# Altium PCB HFPB_01-PCB.PcbDoc (part 1 of 5)
Units mm, origin at the board's own origin, x right, y up, seen from the top; angles counter-clockwise.
Board outline 125 x 200 mm, 8 copper layers (Top Layer, Signal Layer 1, Signal Layer 2, Signal Layer 3, Signal Layer 4, Signal Layer 5, Signal Layer 6, Bottom Layer), stack 1.53 mm thick; 382 components, 179 nets, 1080 pads, 272 vias.
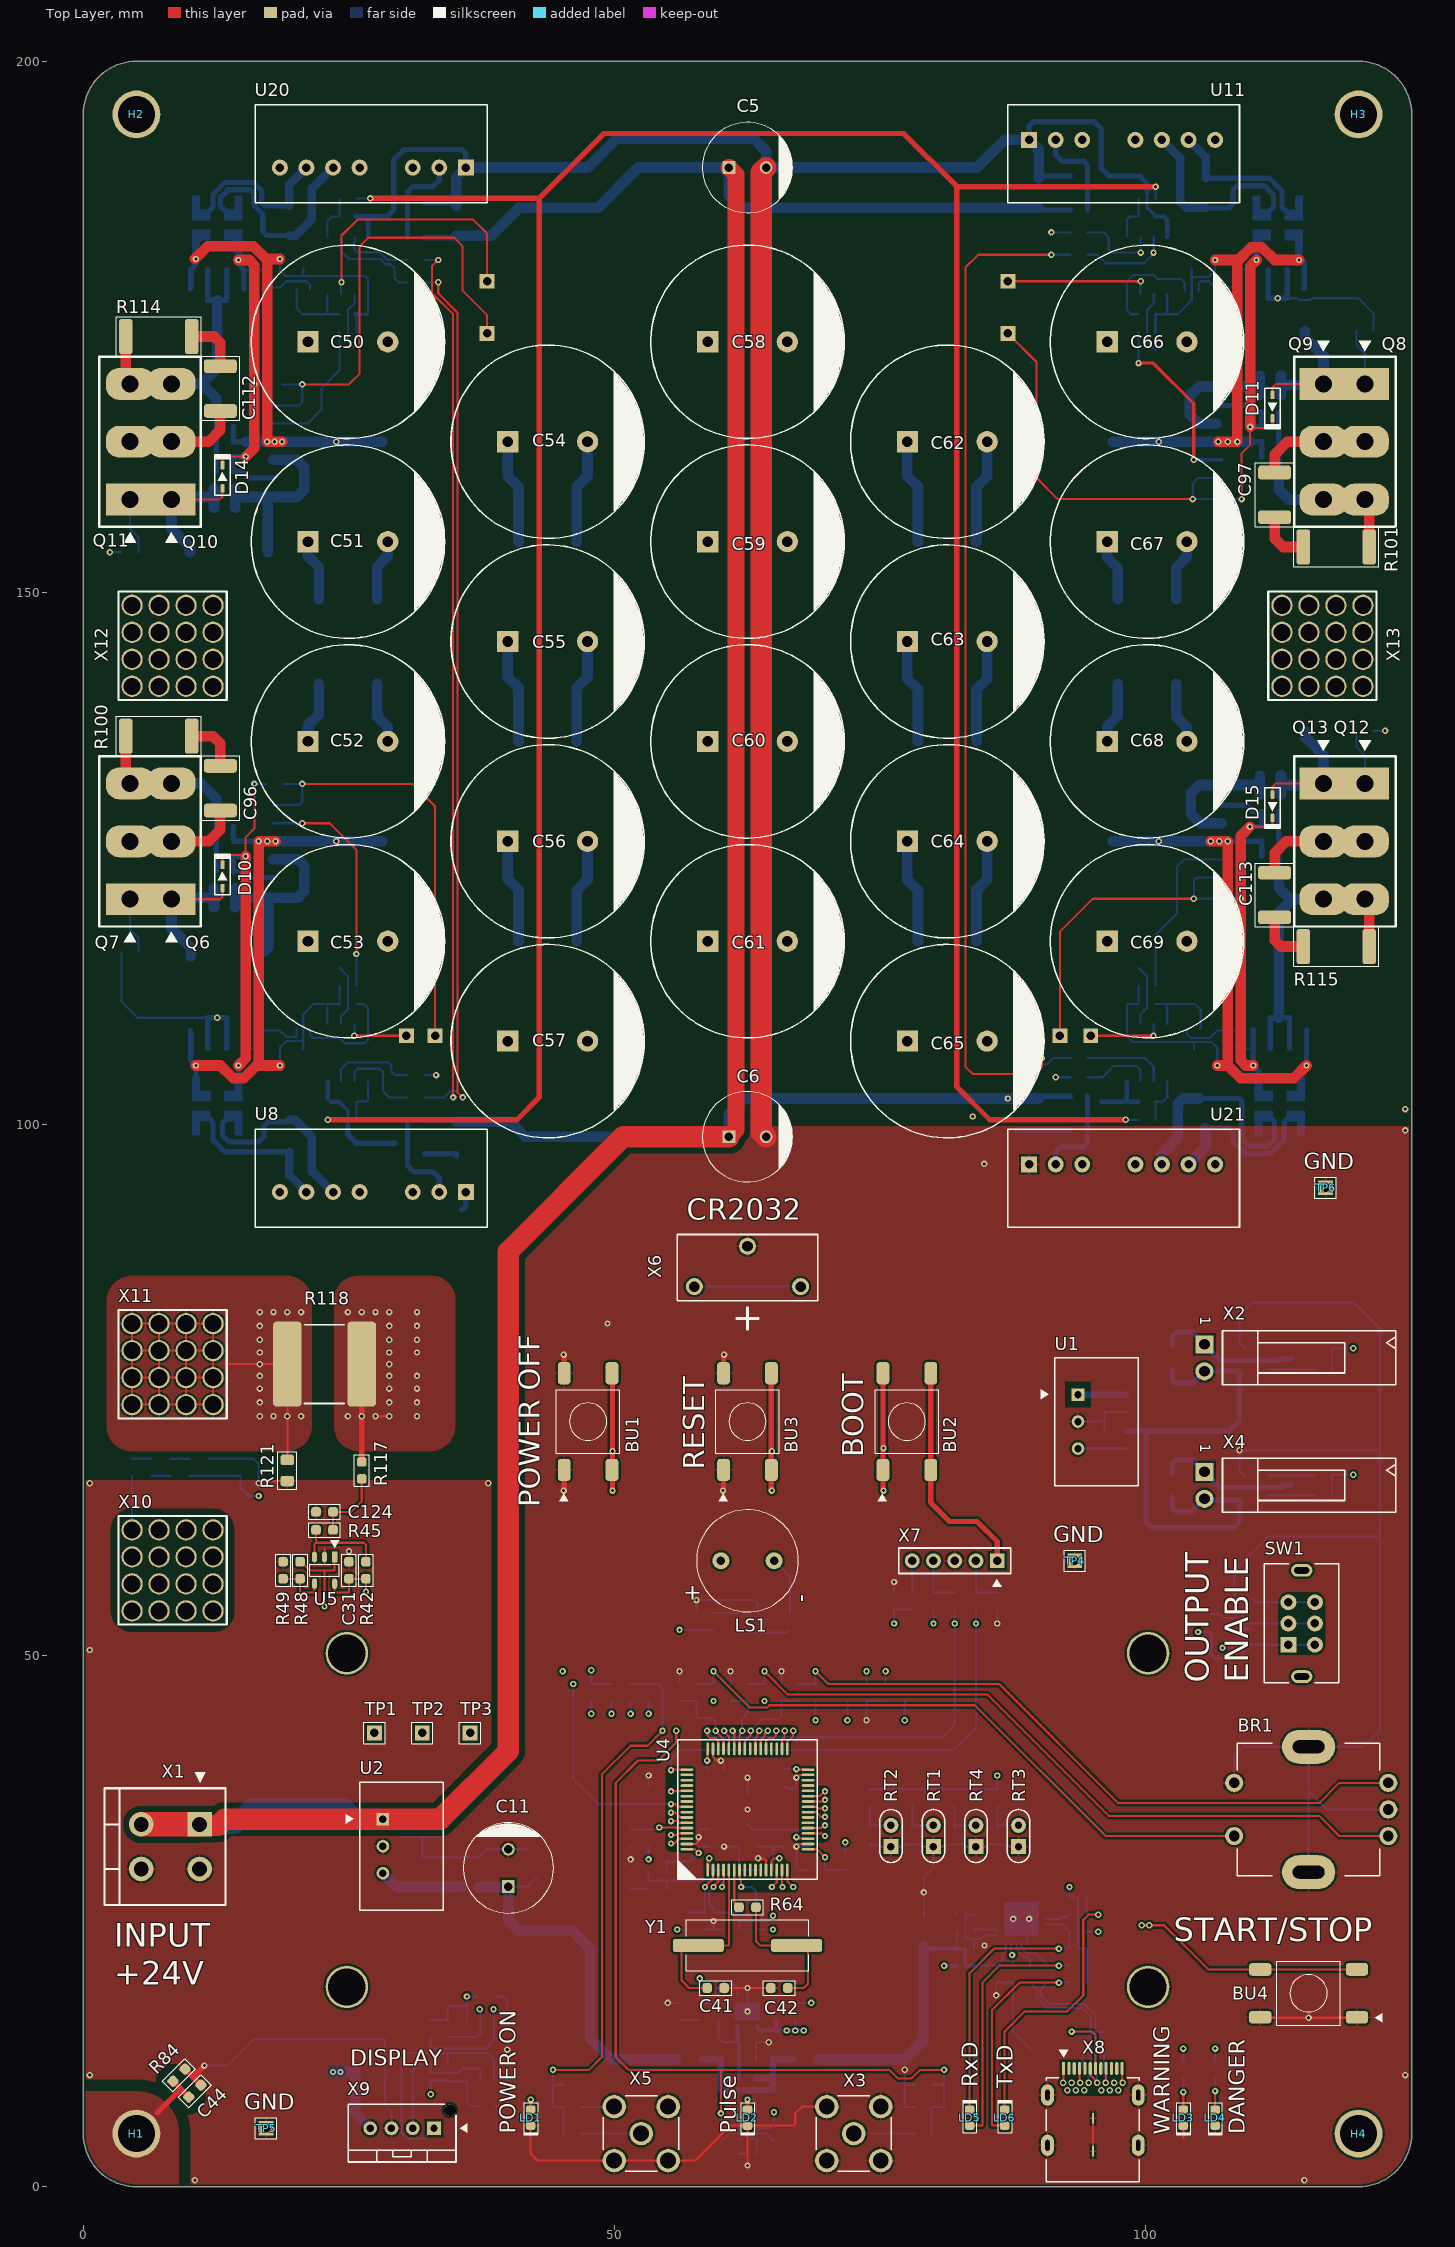
[diagram p0: Top Layer view]
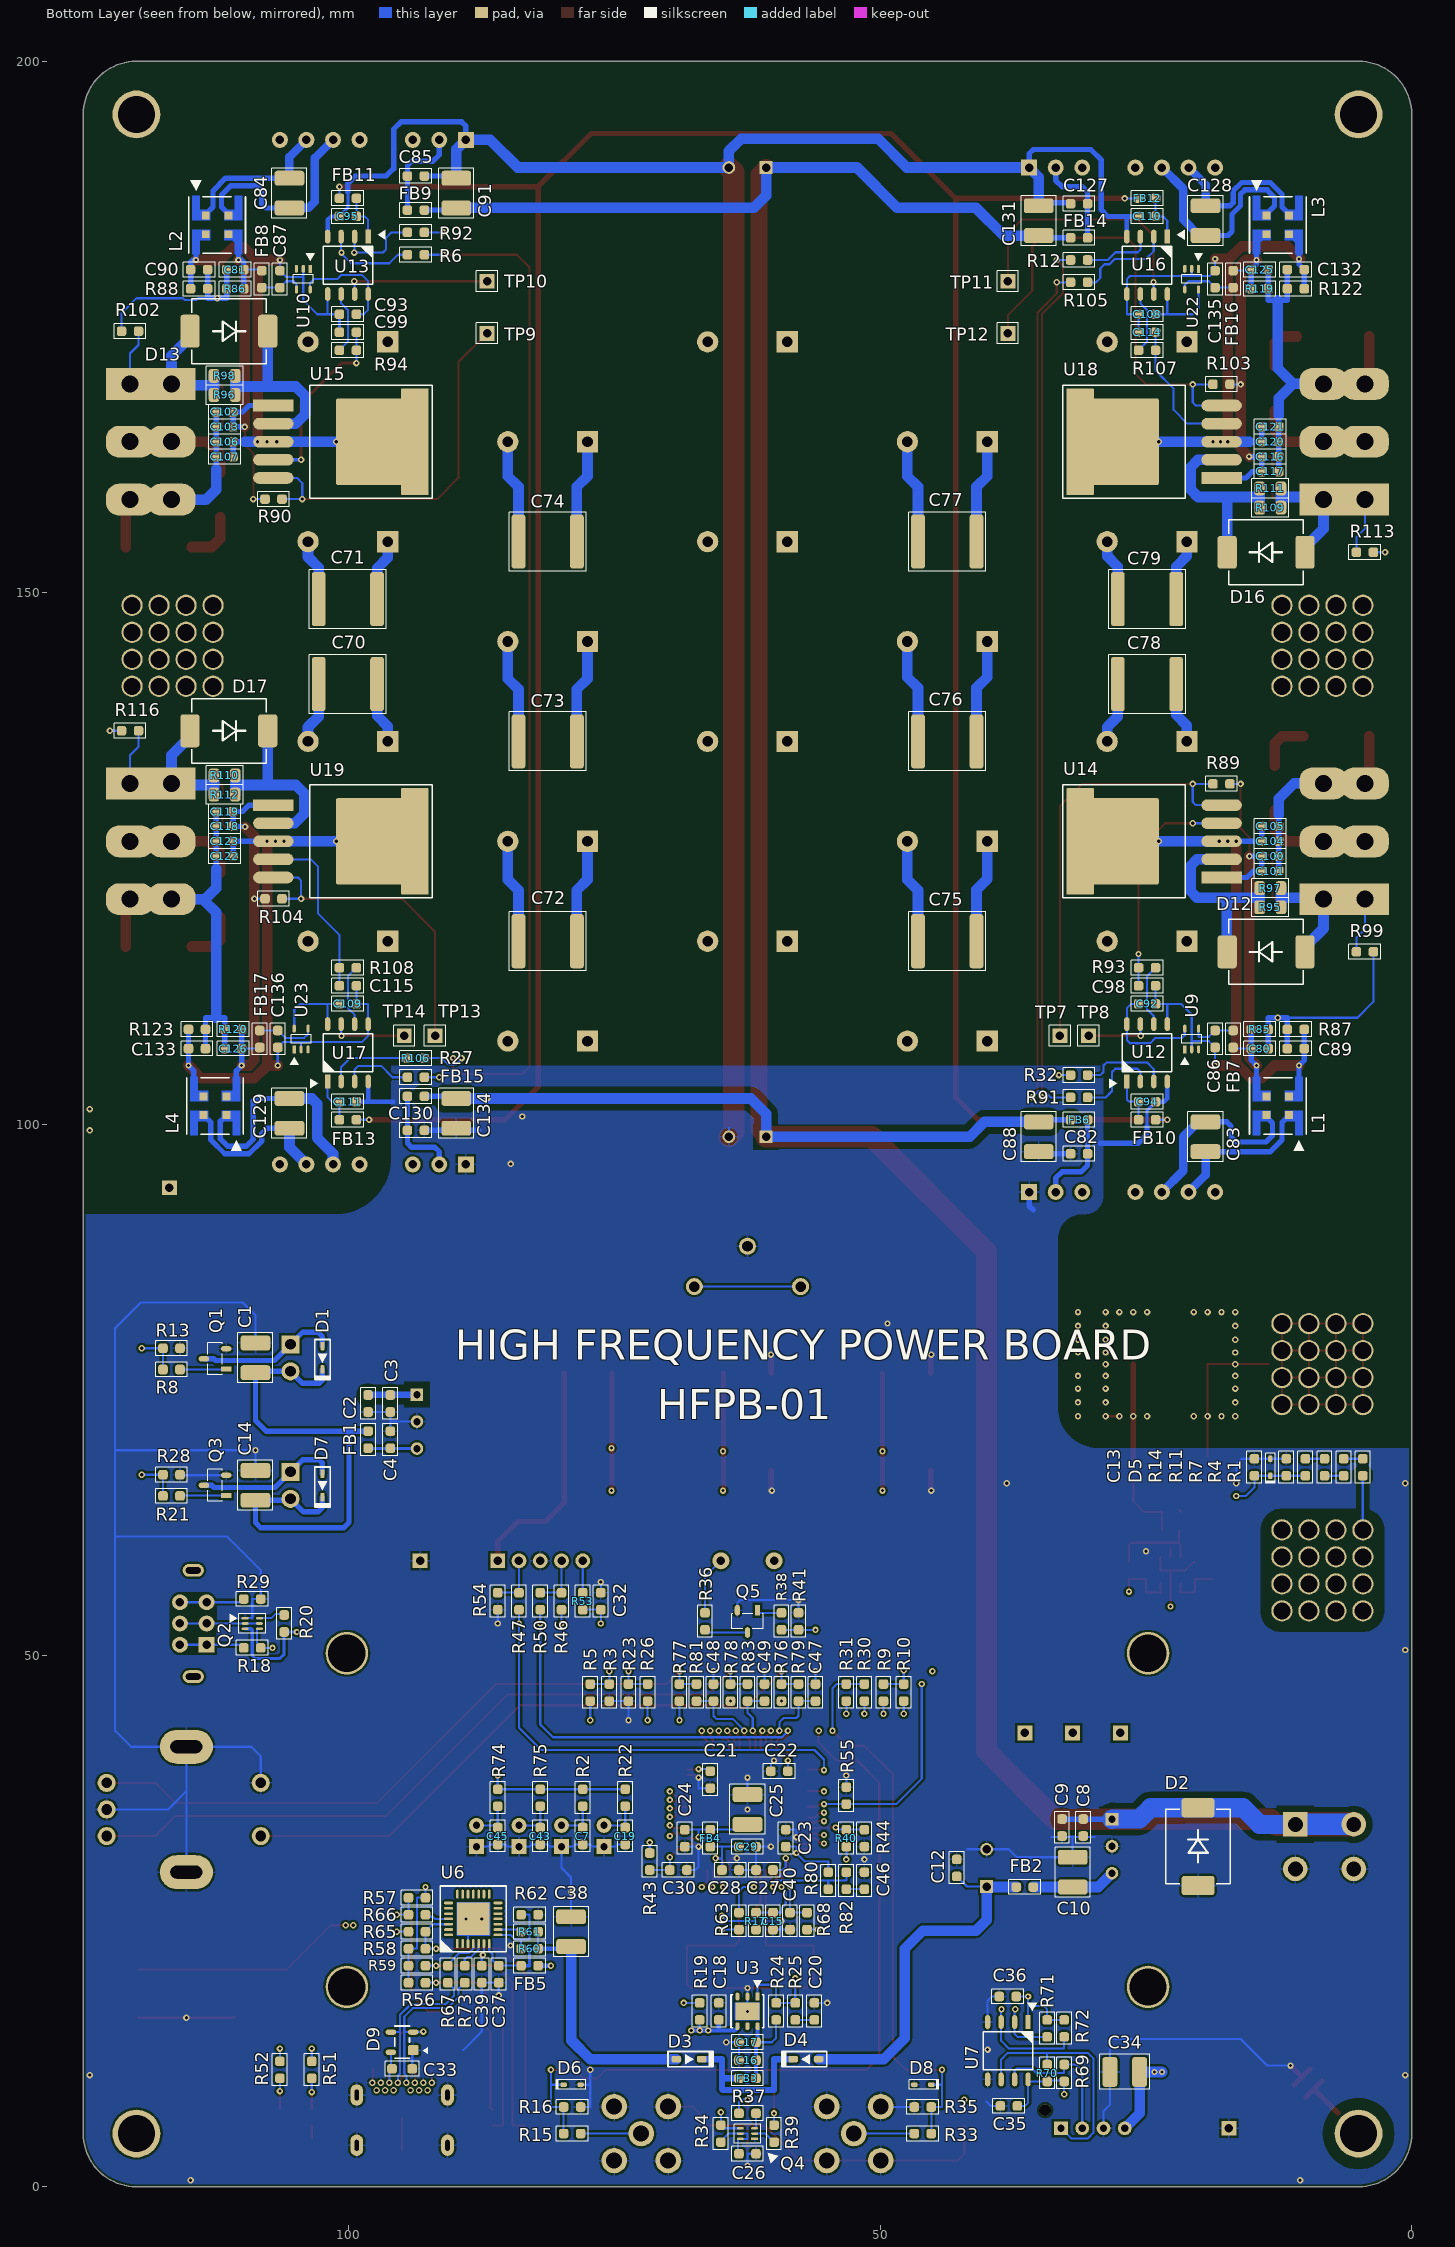
[diagram p1: Bottom Layer view, seen from below]
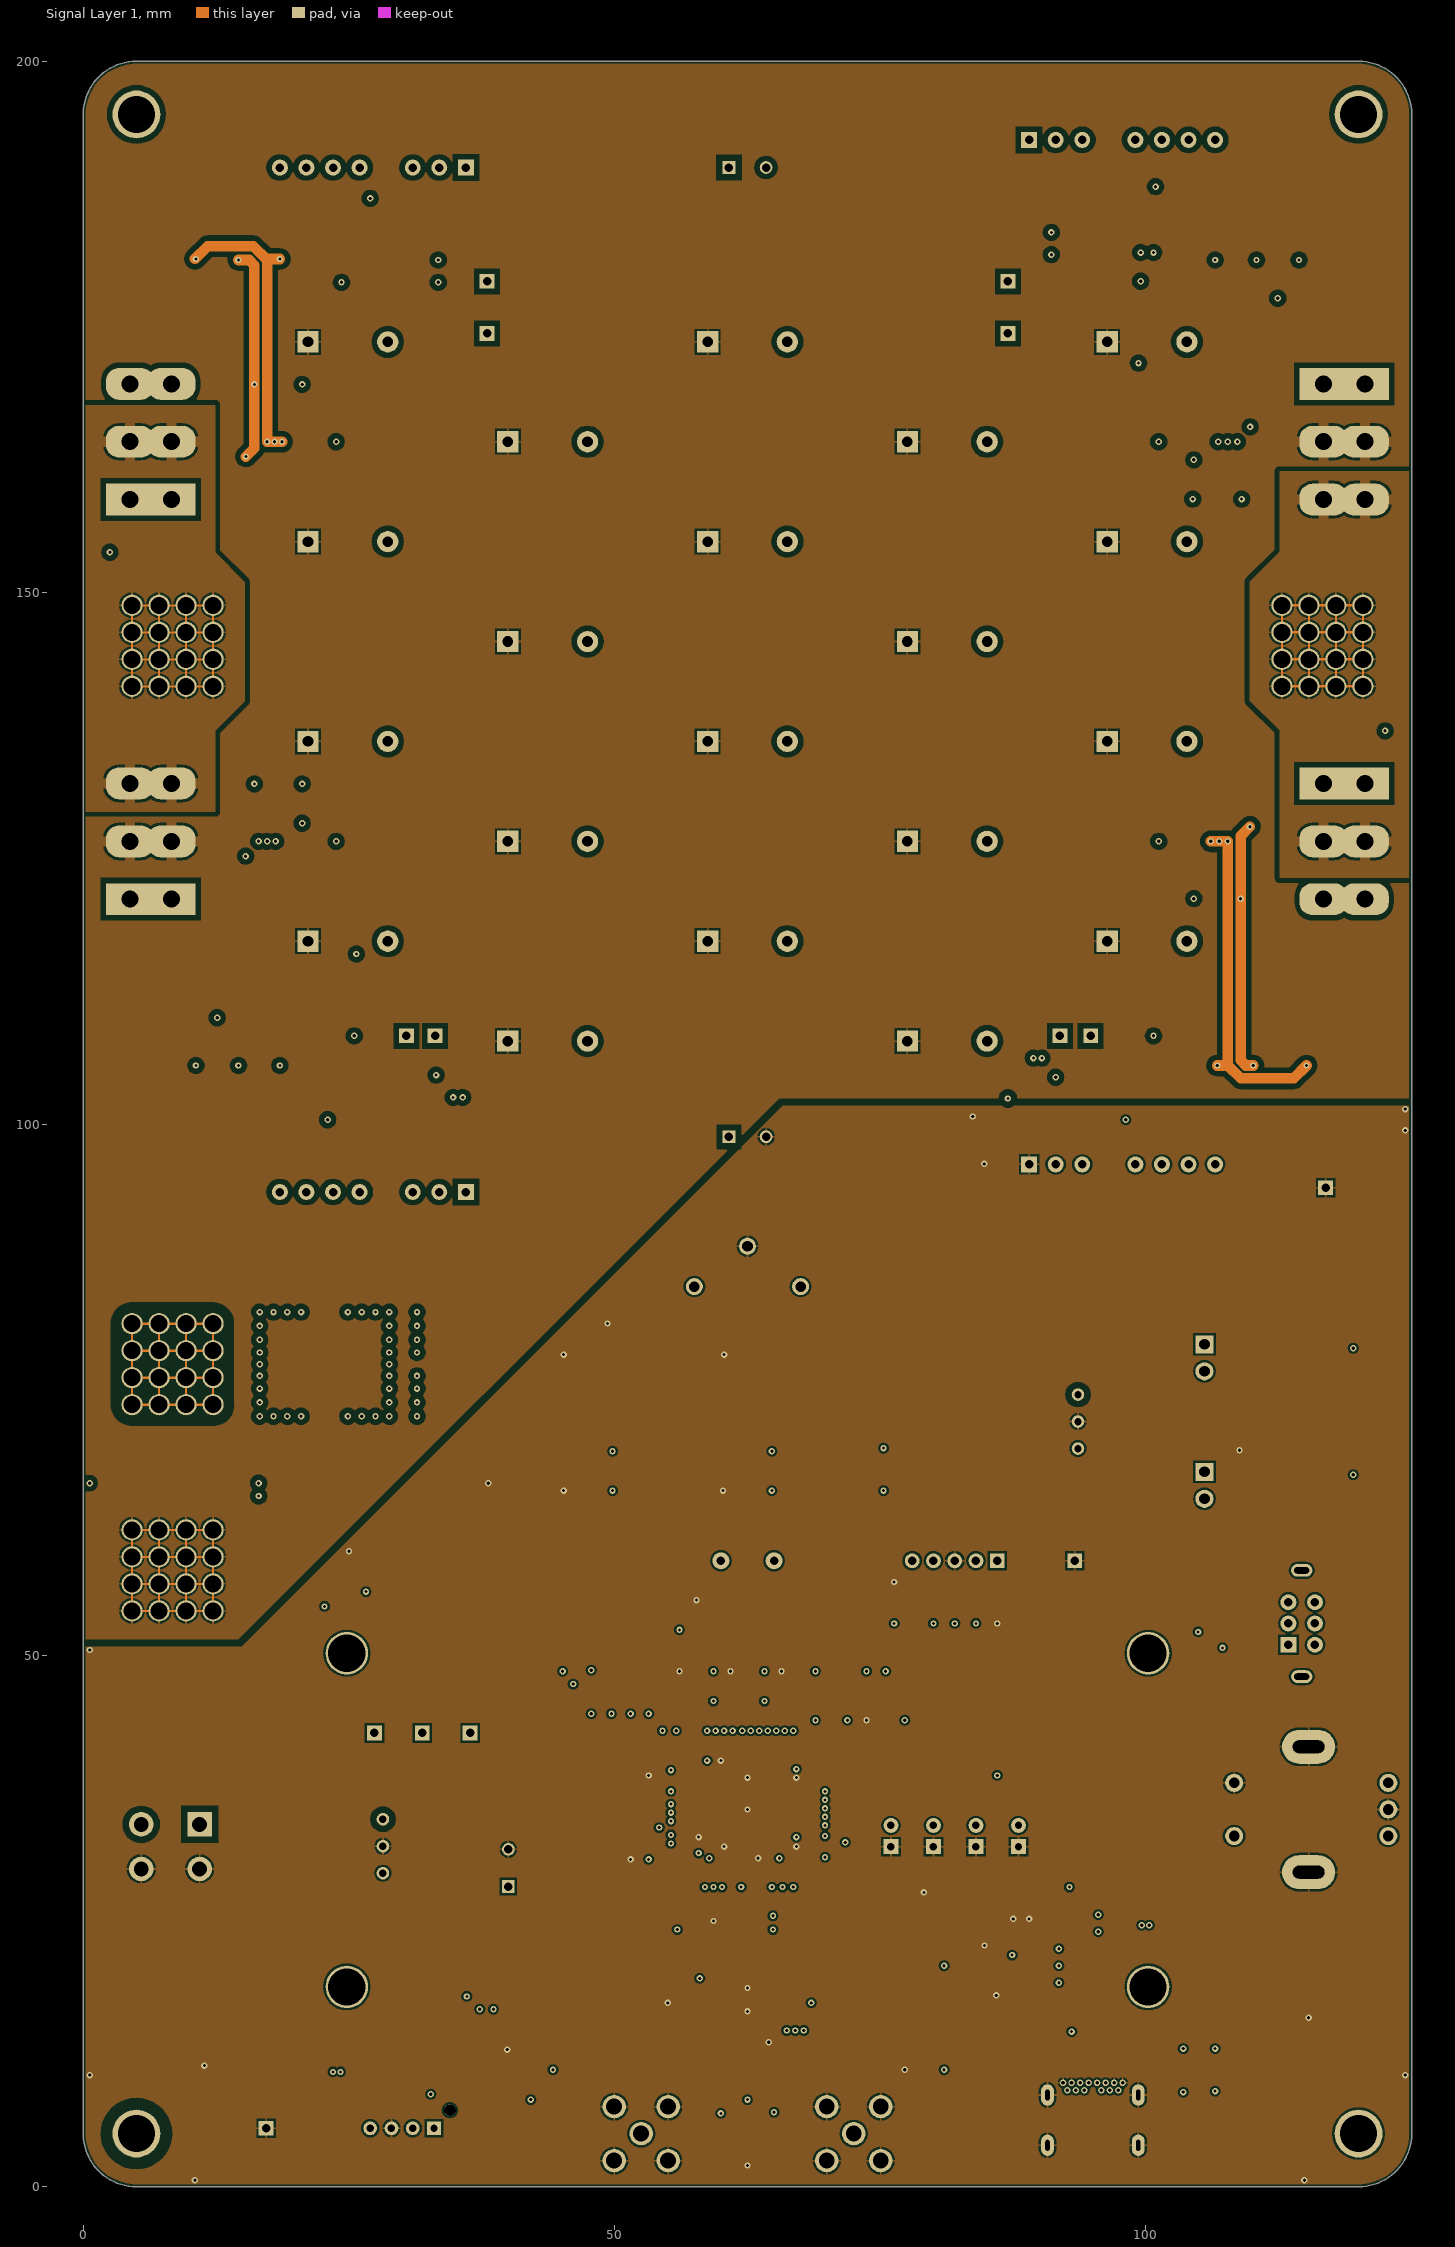
[diagram p2: Signal Layer 1]
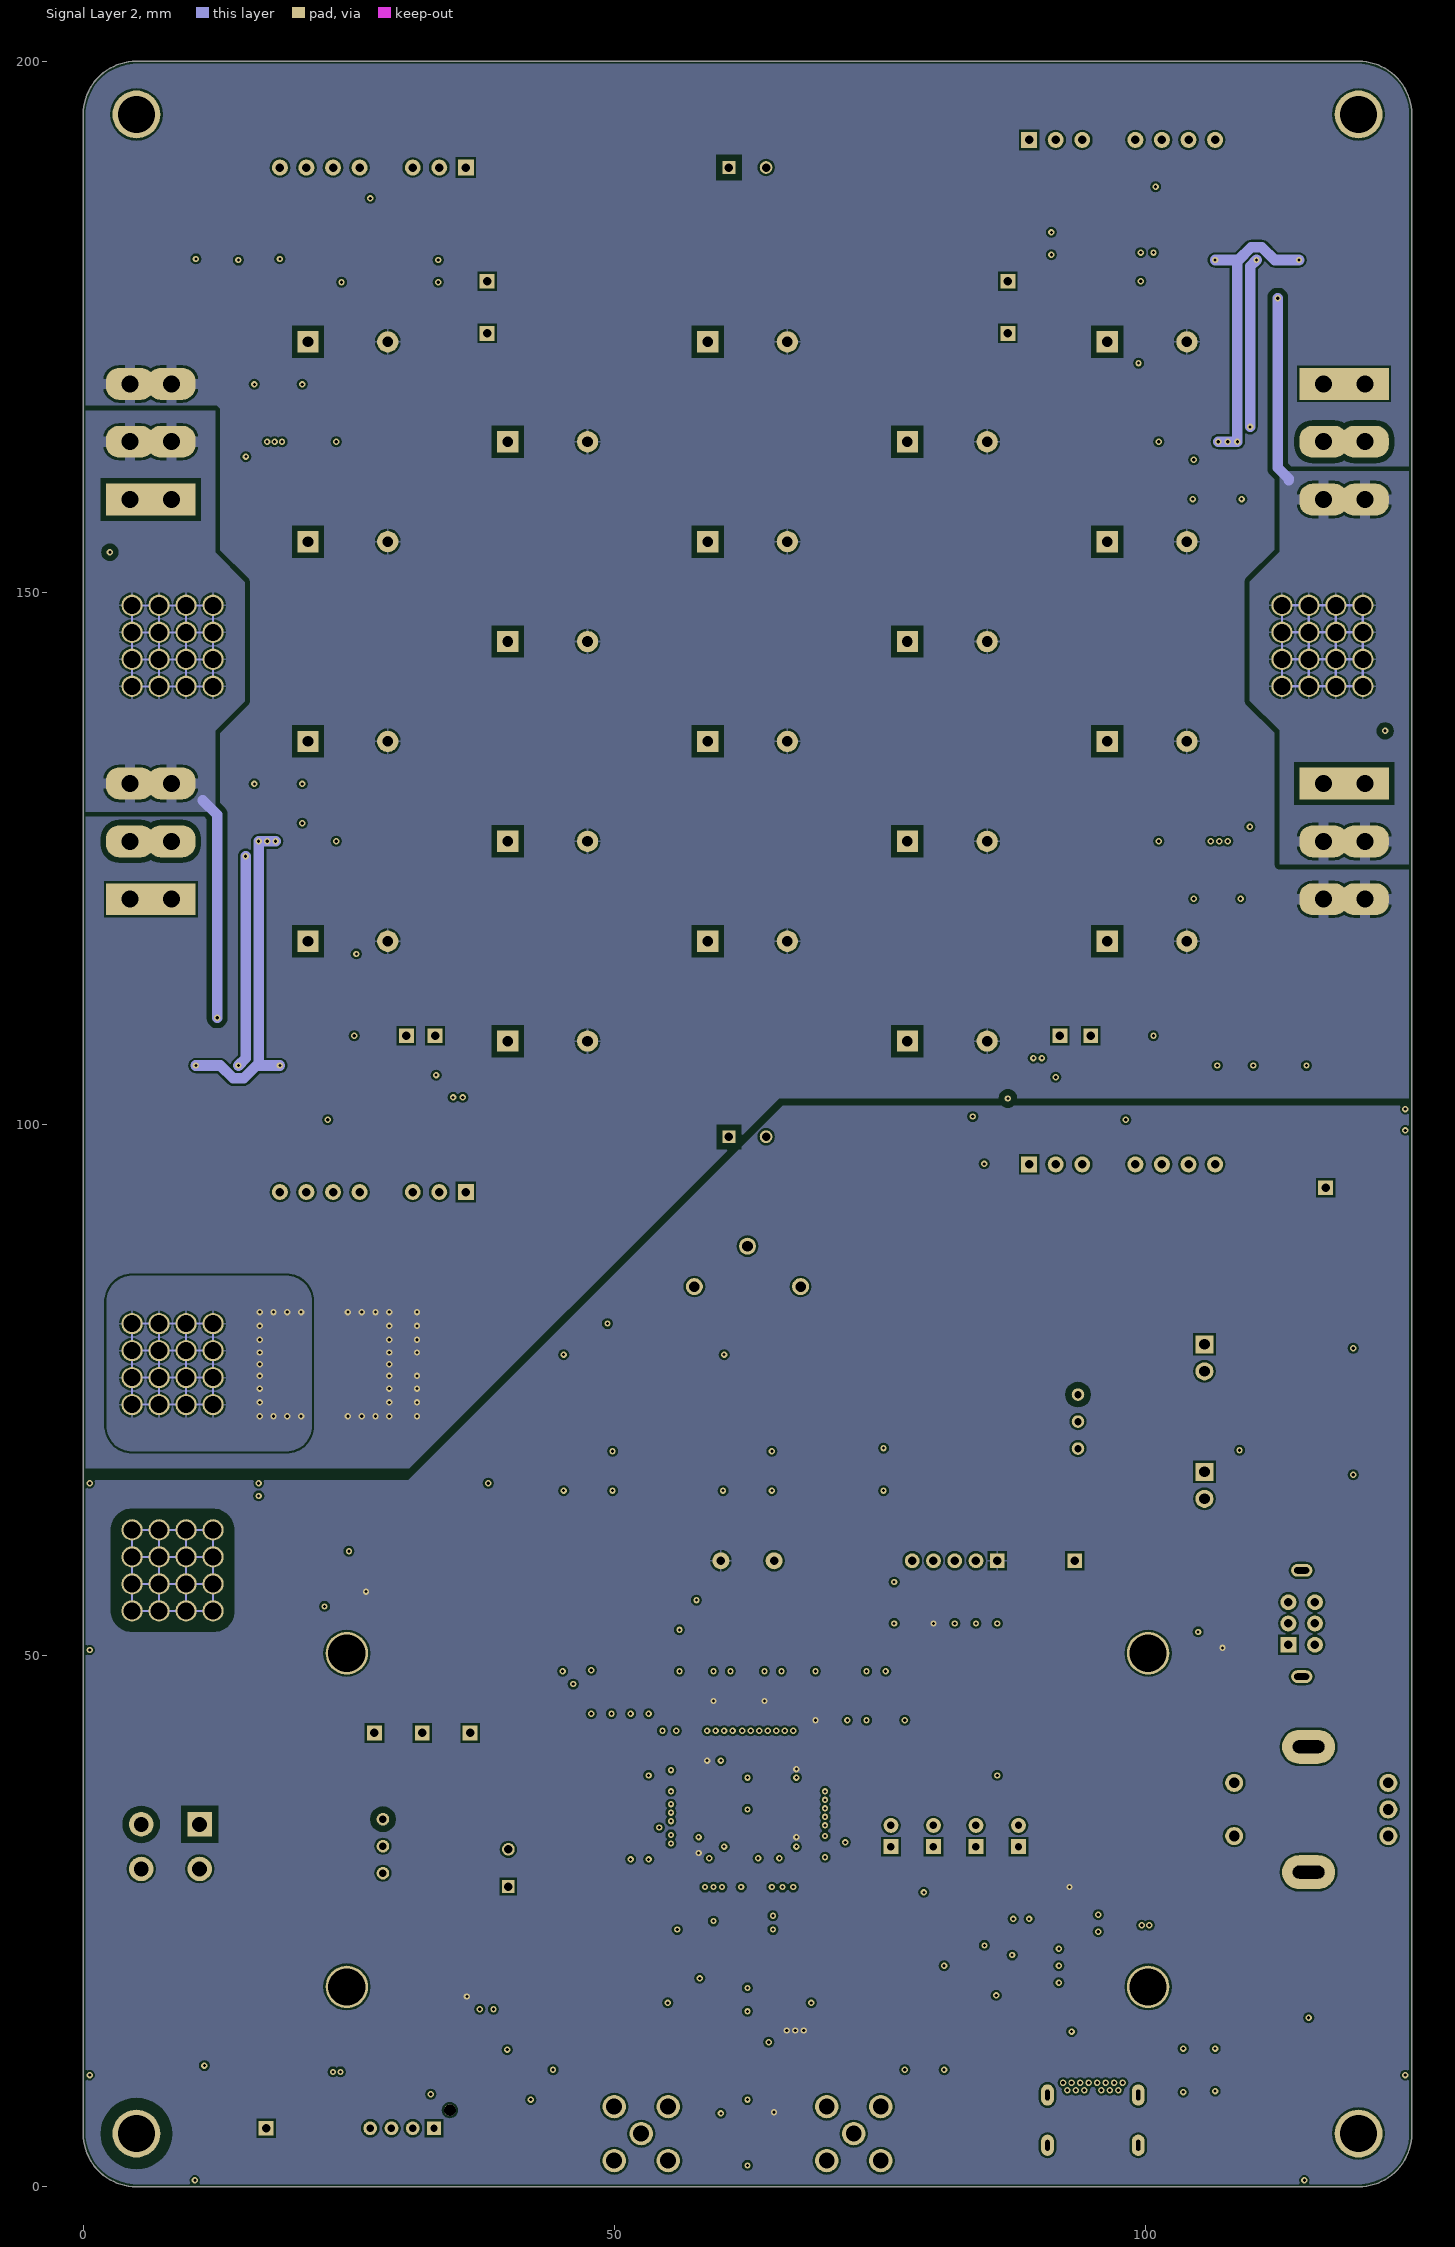
[diagram p3: Signal Layer 2]
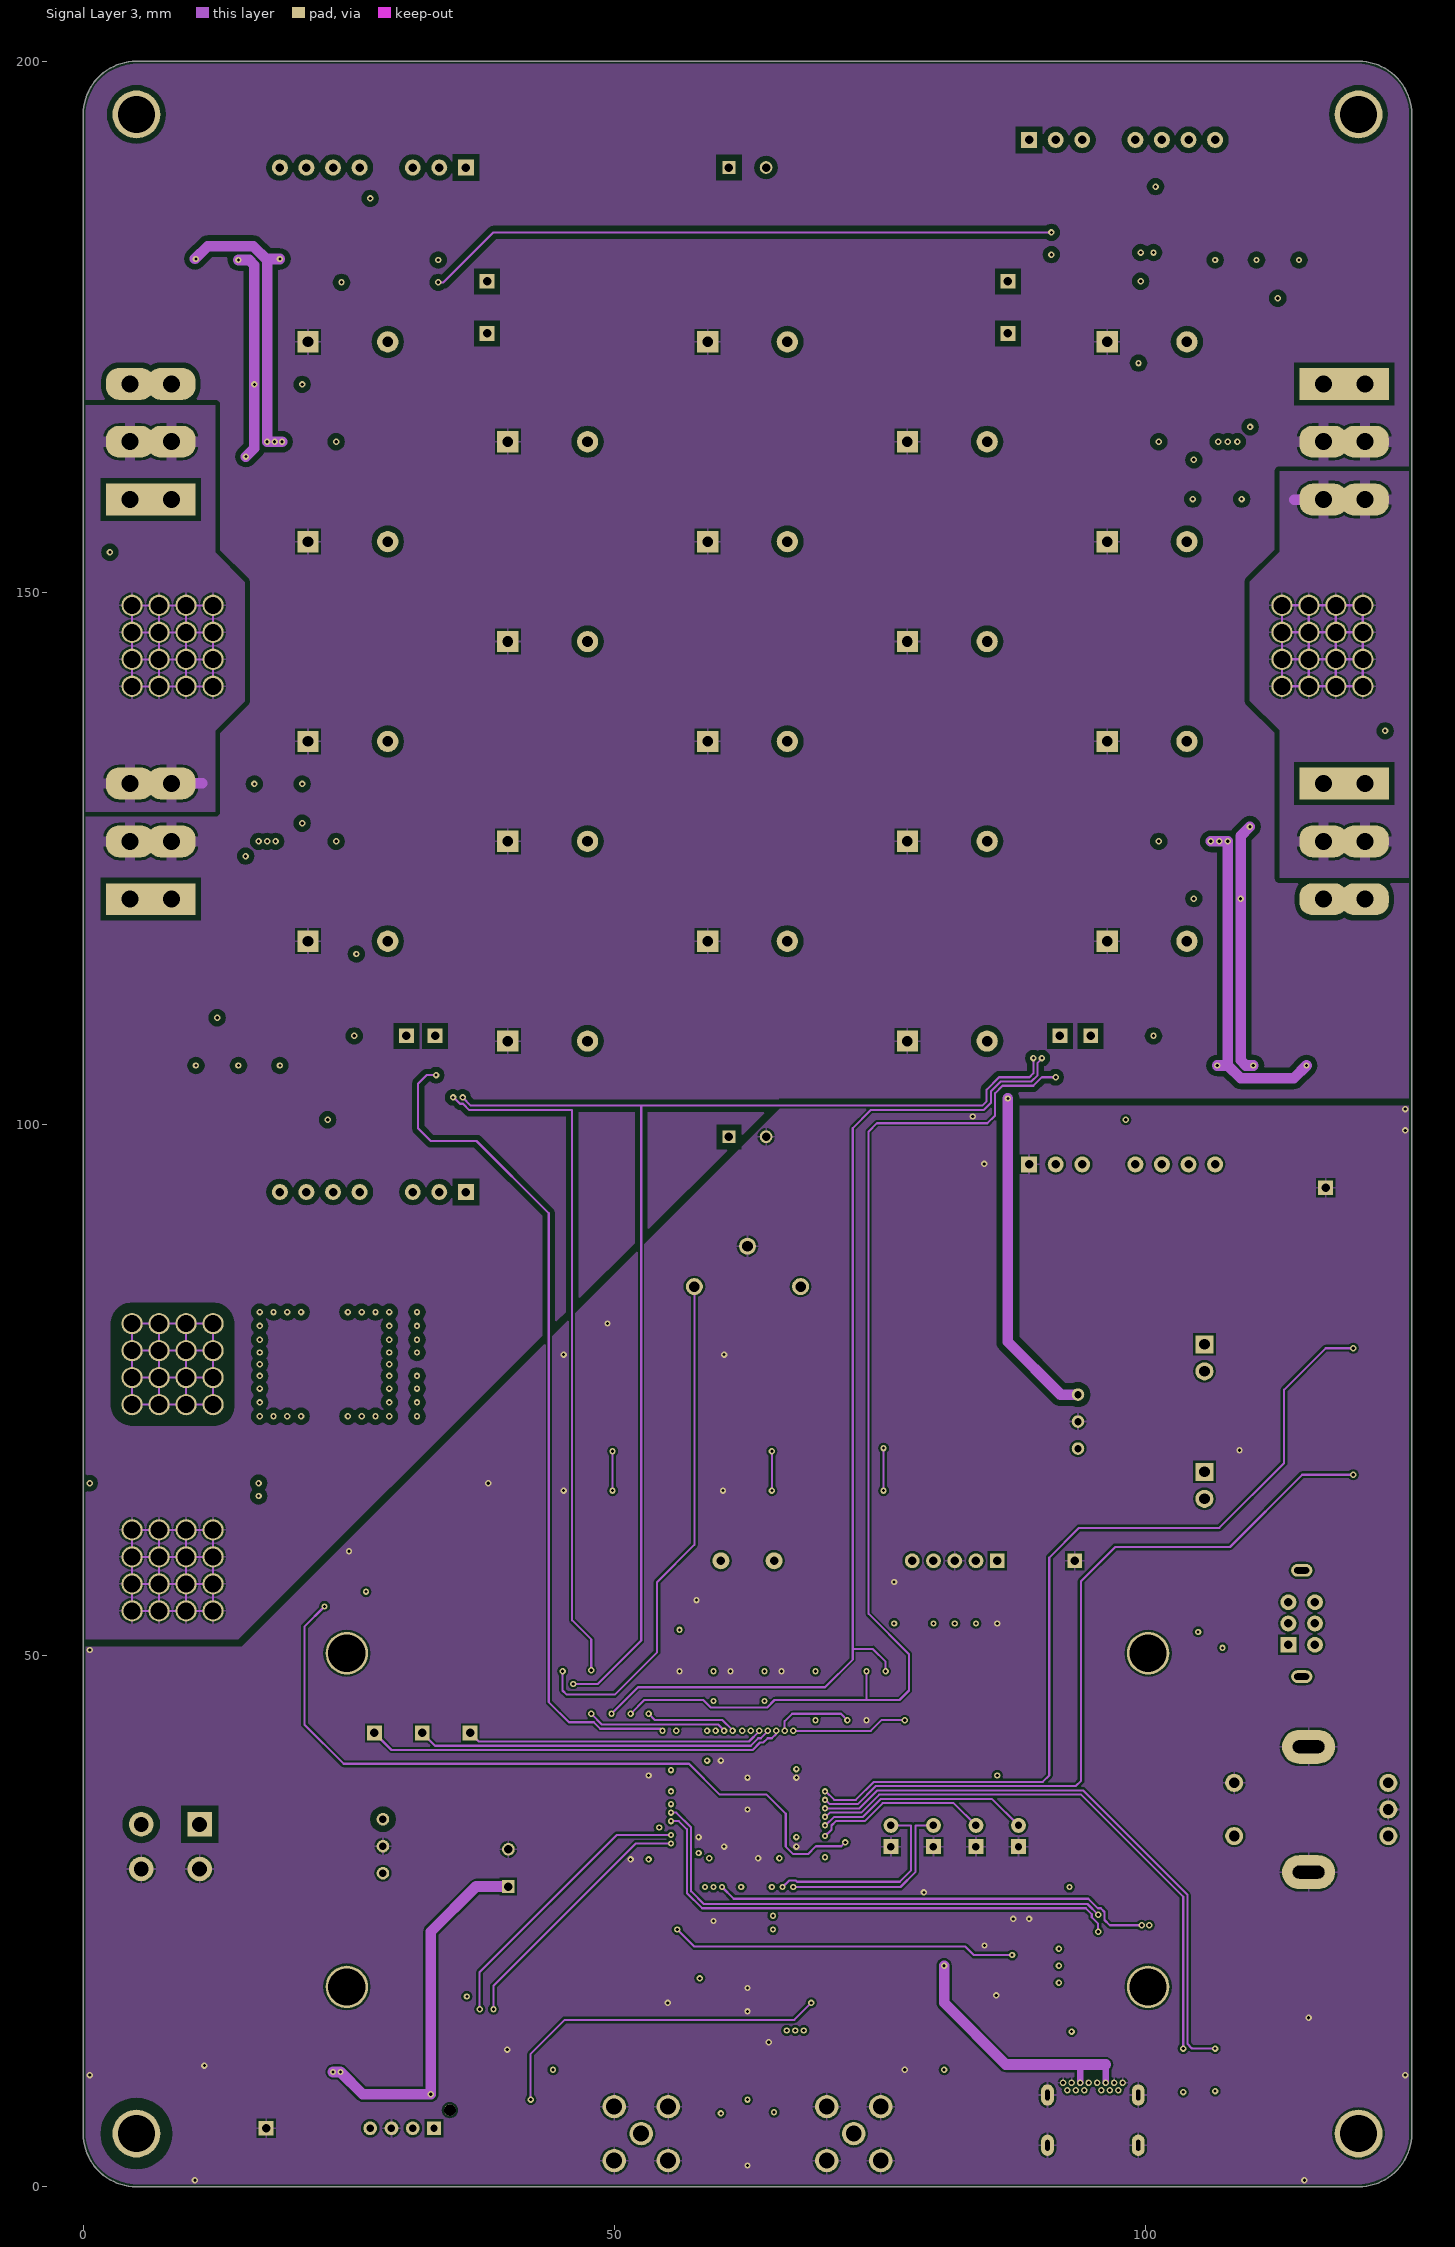
[diagram p4: Signal Layer 3]
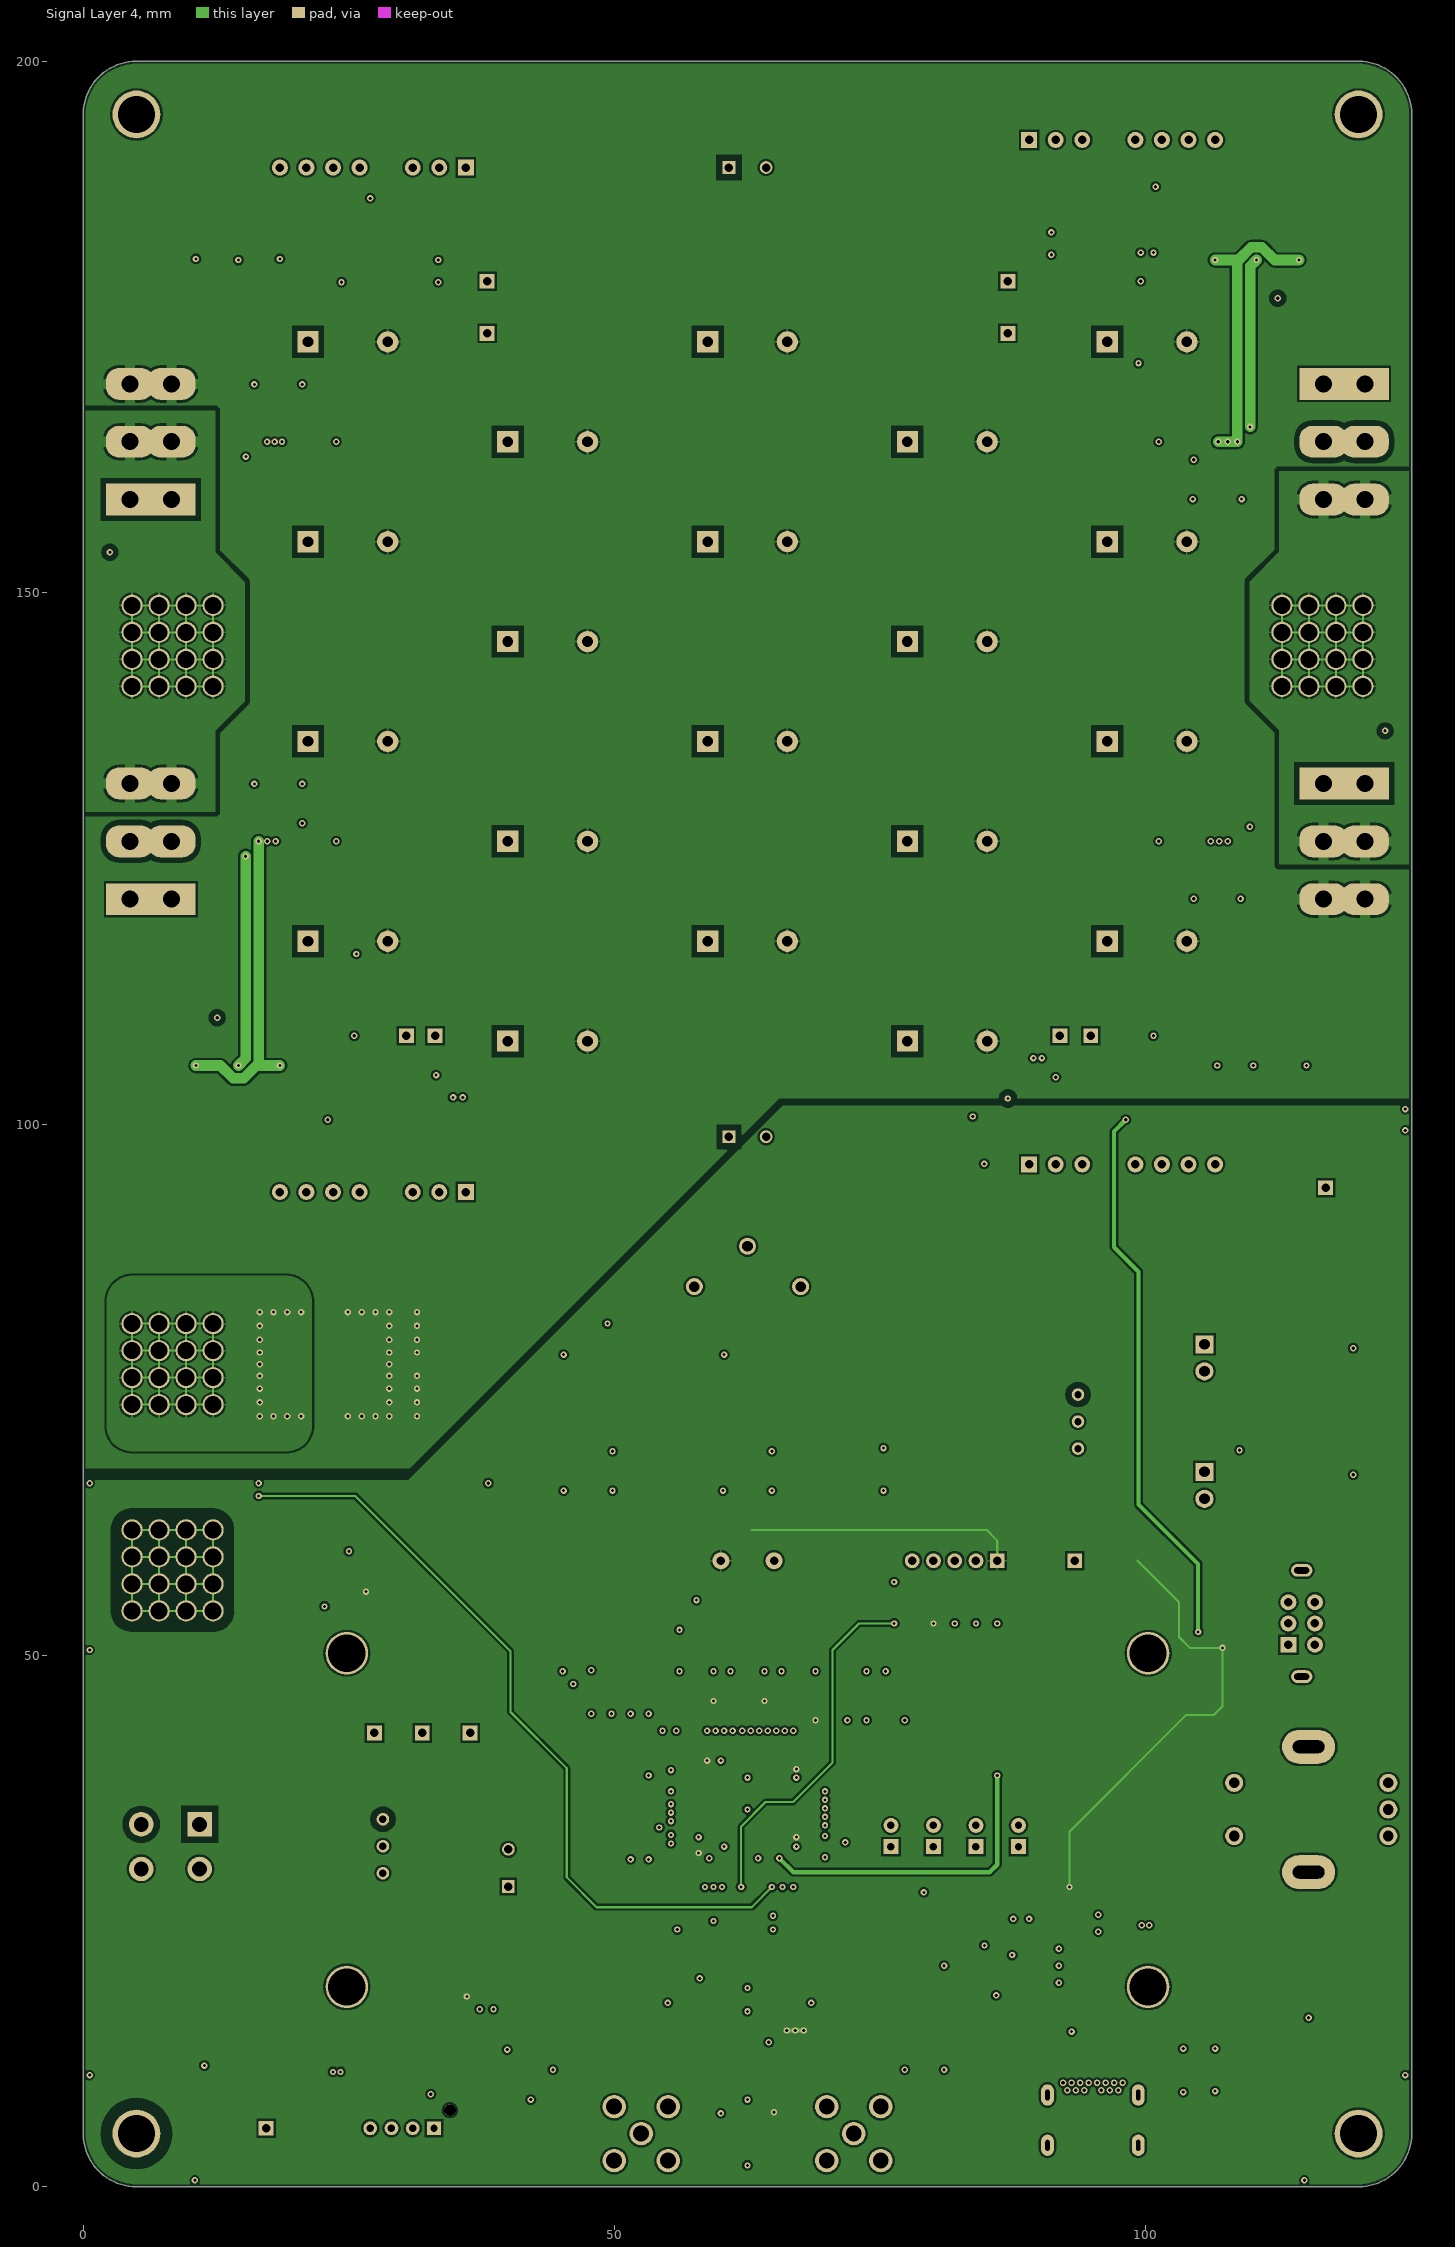
[diagram p5: Signal Layer 4]
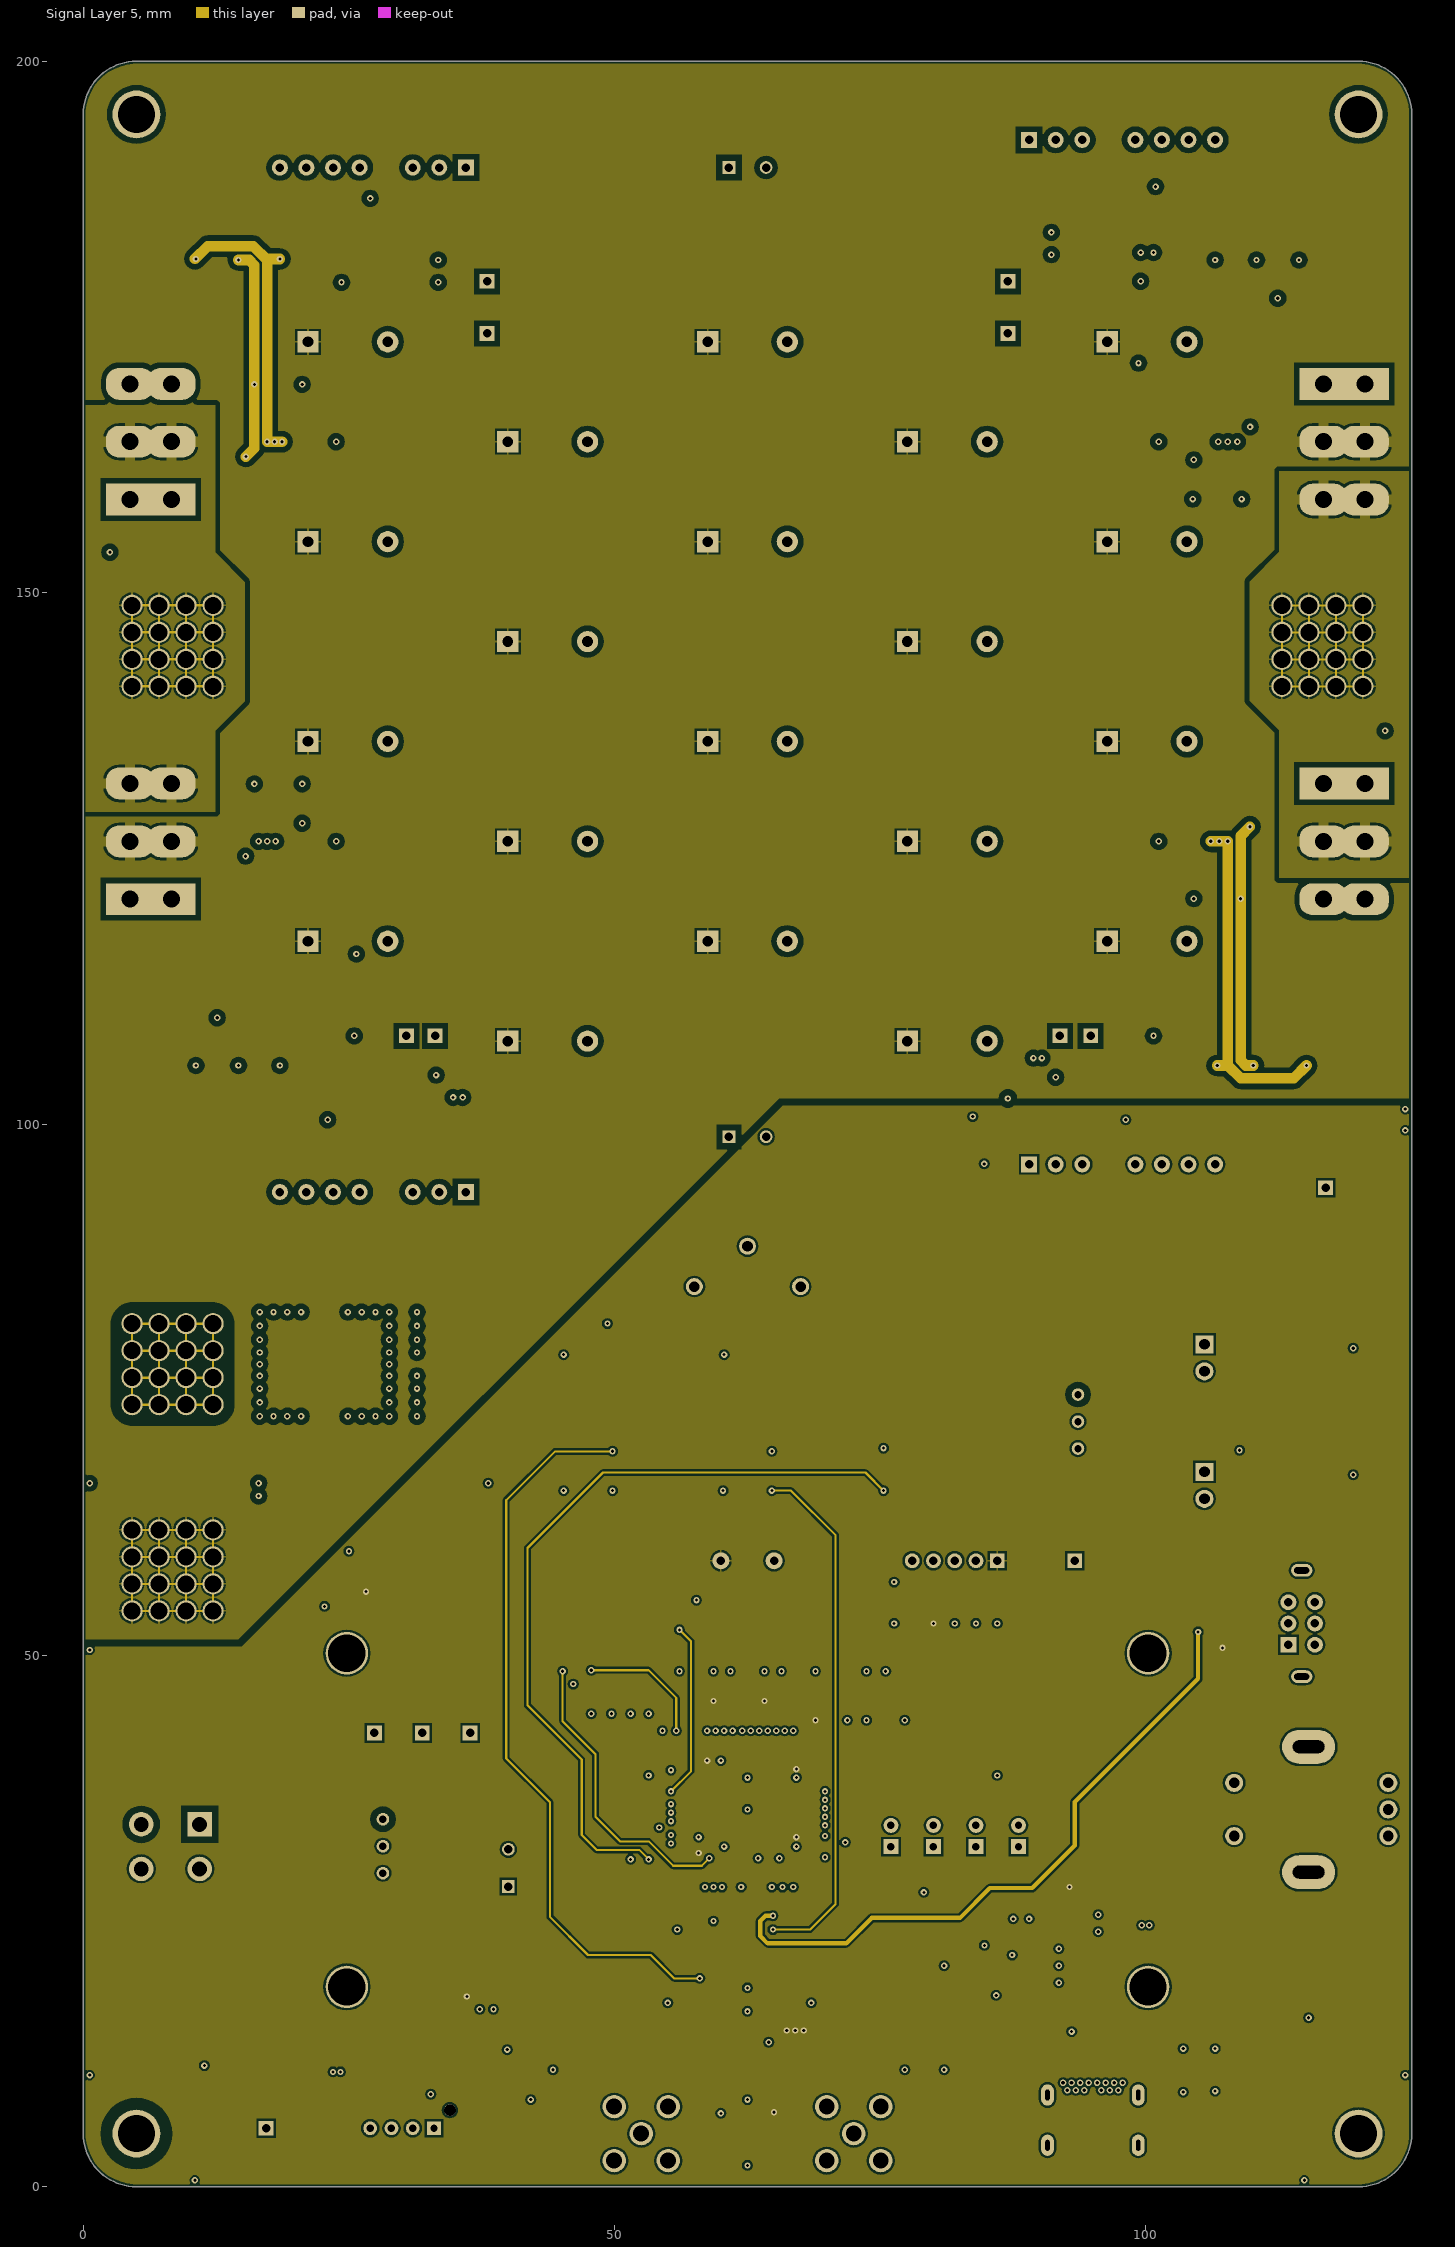
[diagram p6: Signal Layer 5]
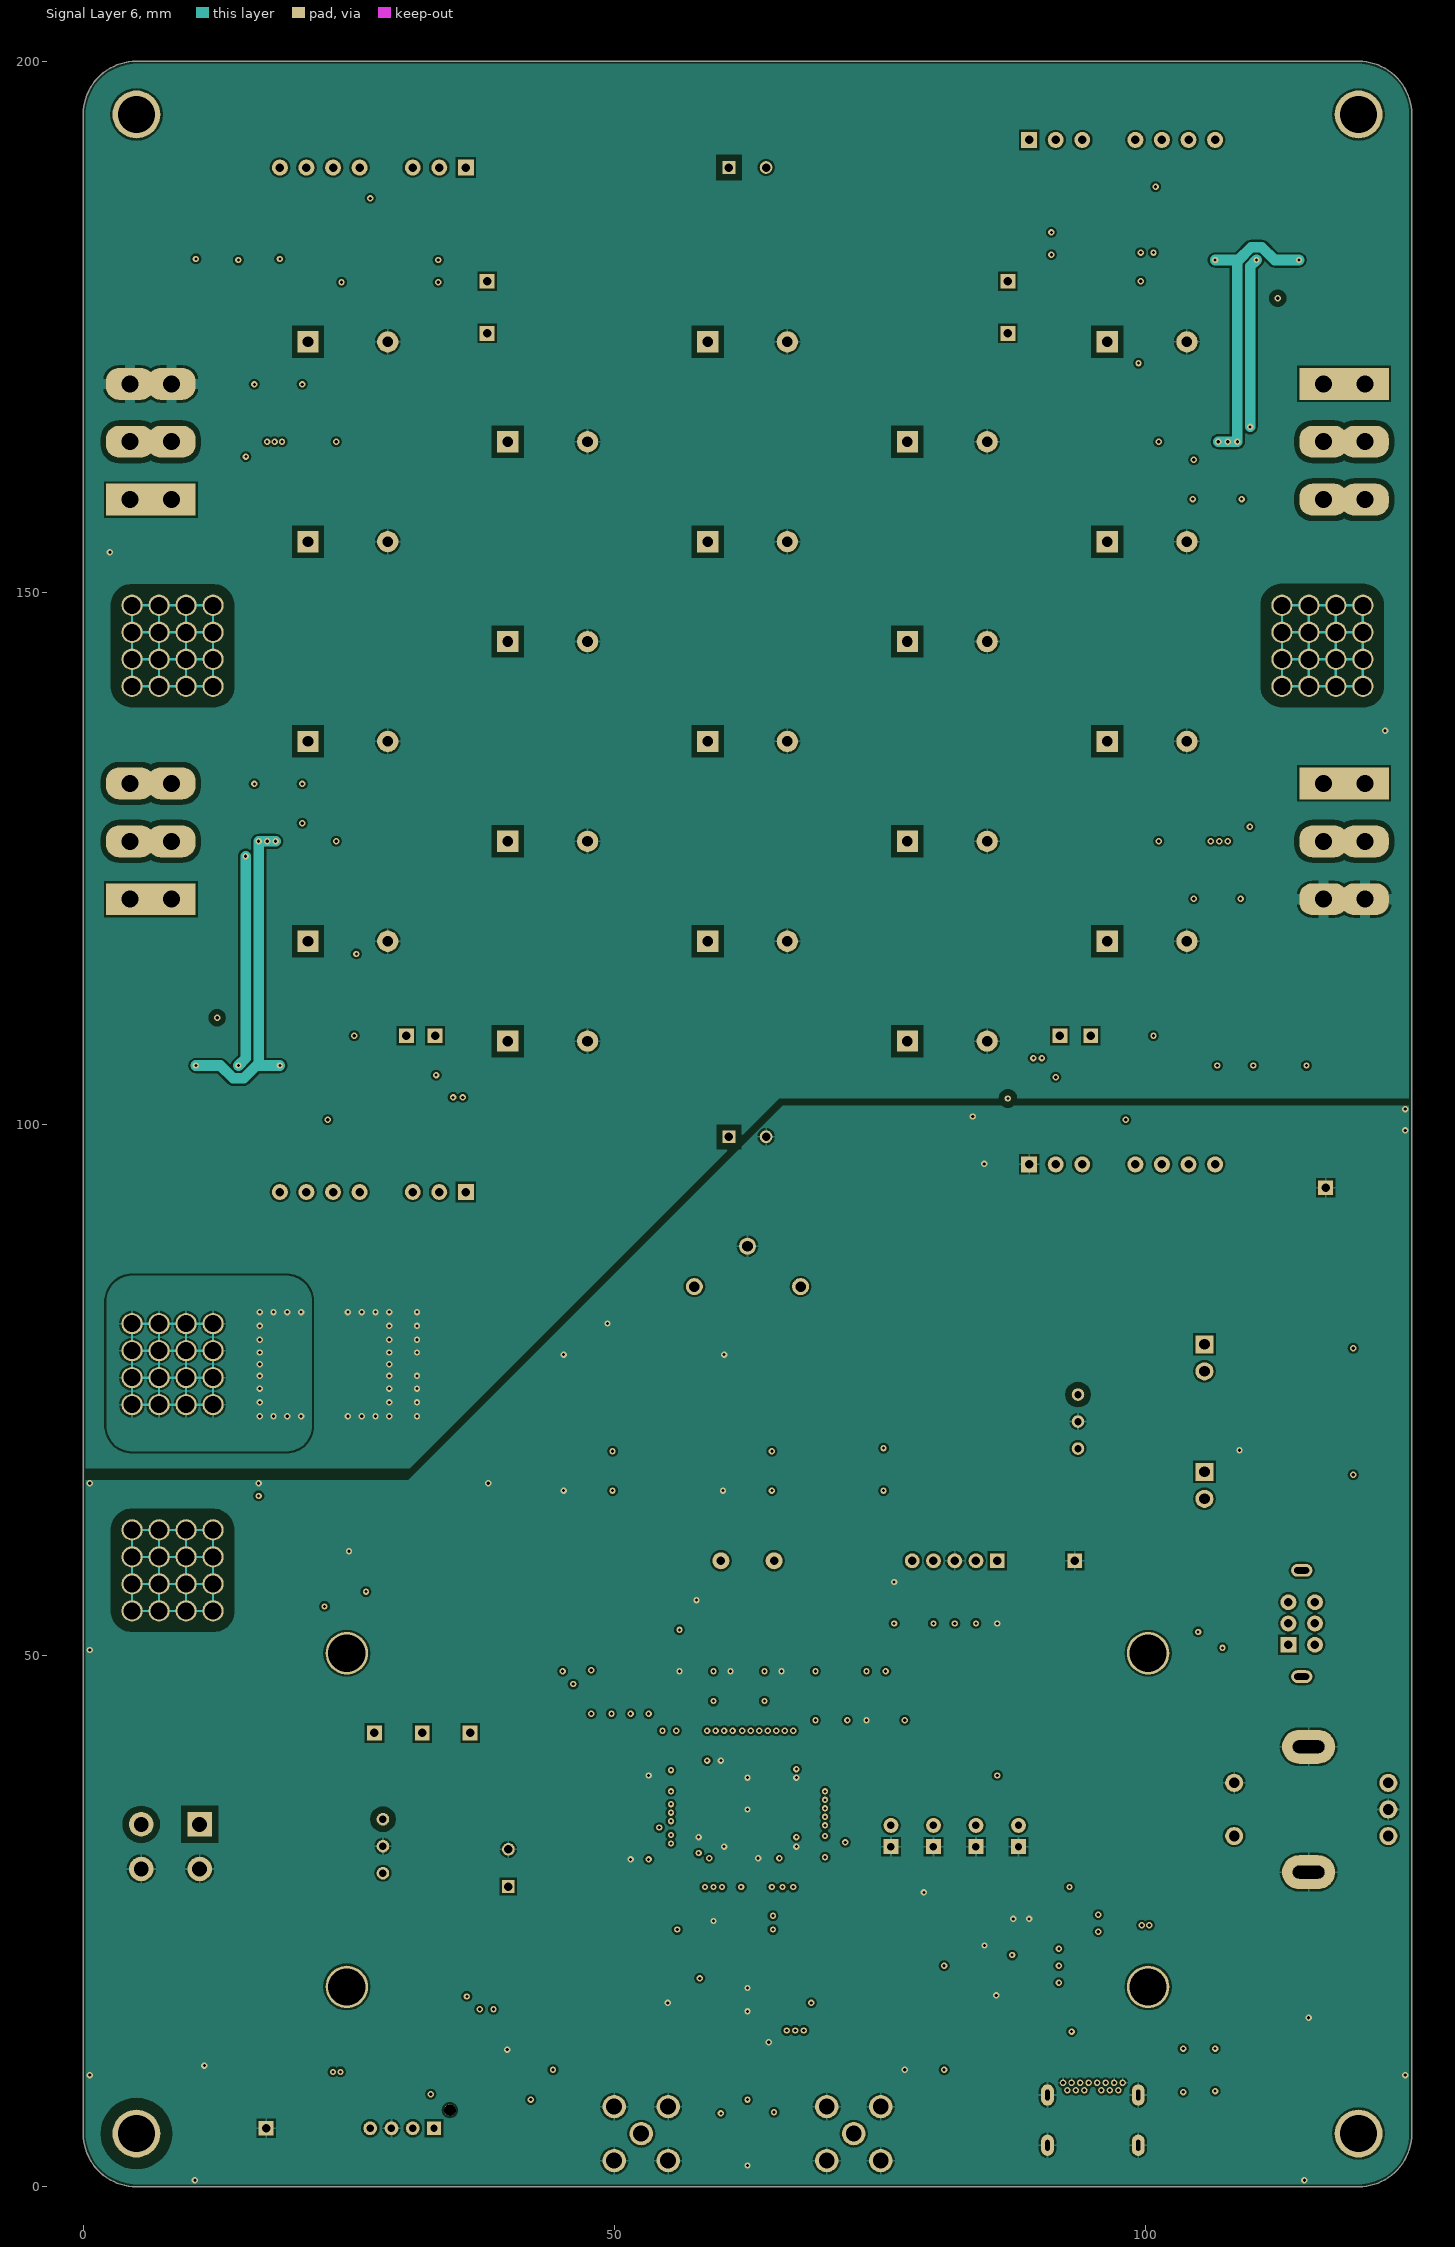
[diagram p7: Signal Layer 6]
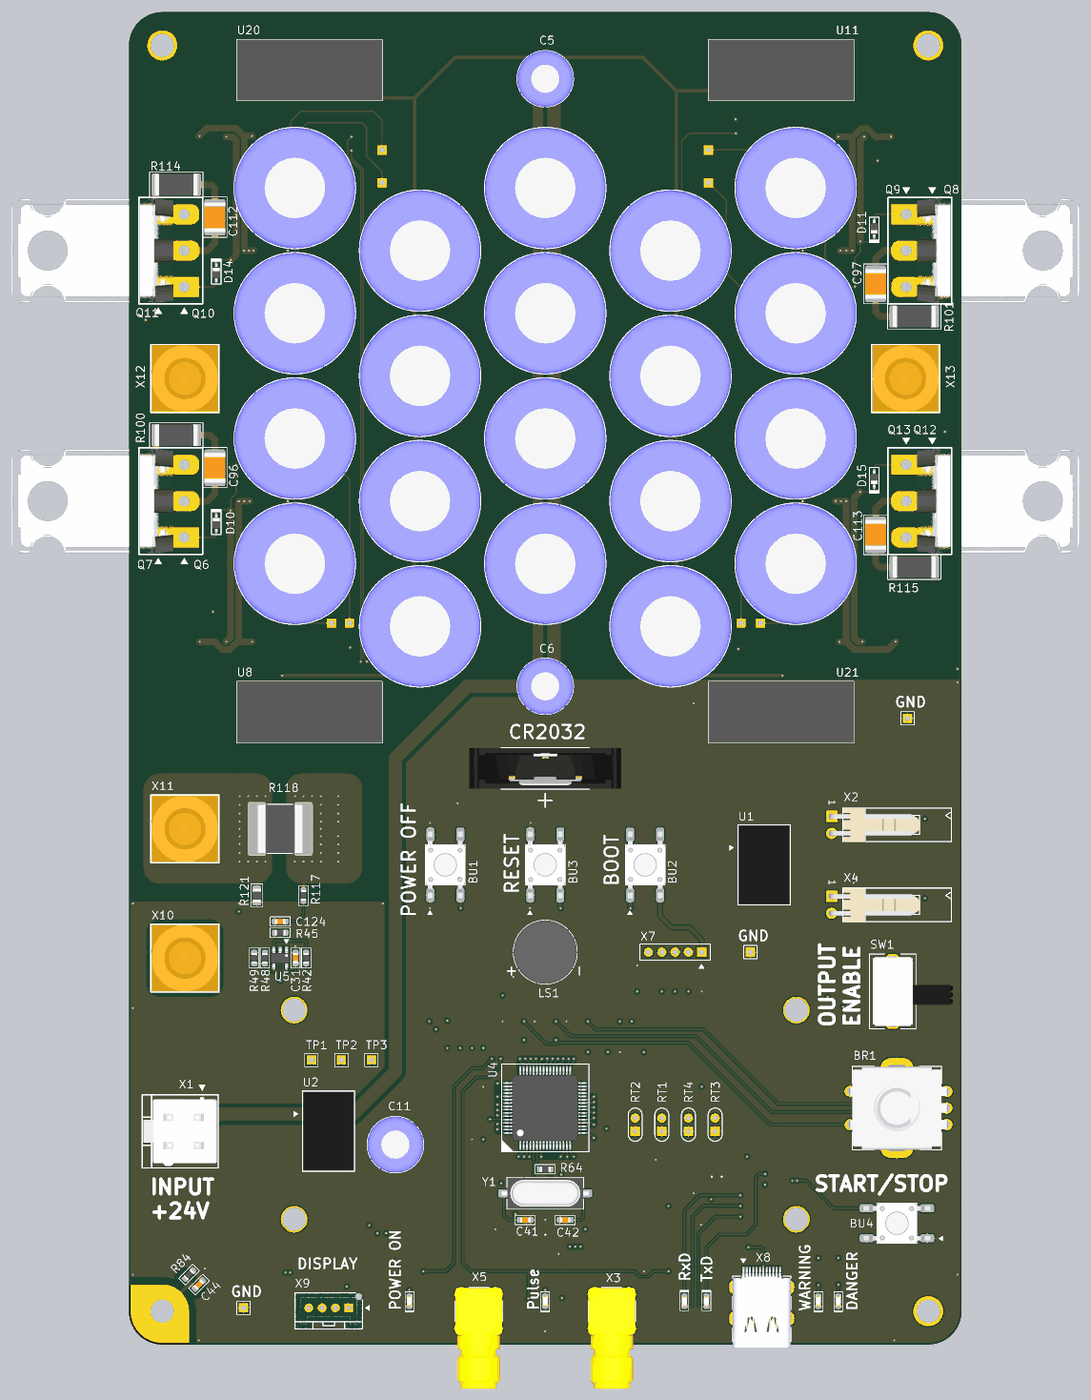
[diagram p11: 3D render of the assembled board from above, using the file's embedded part models]
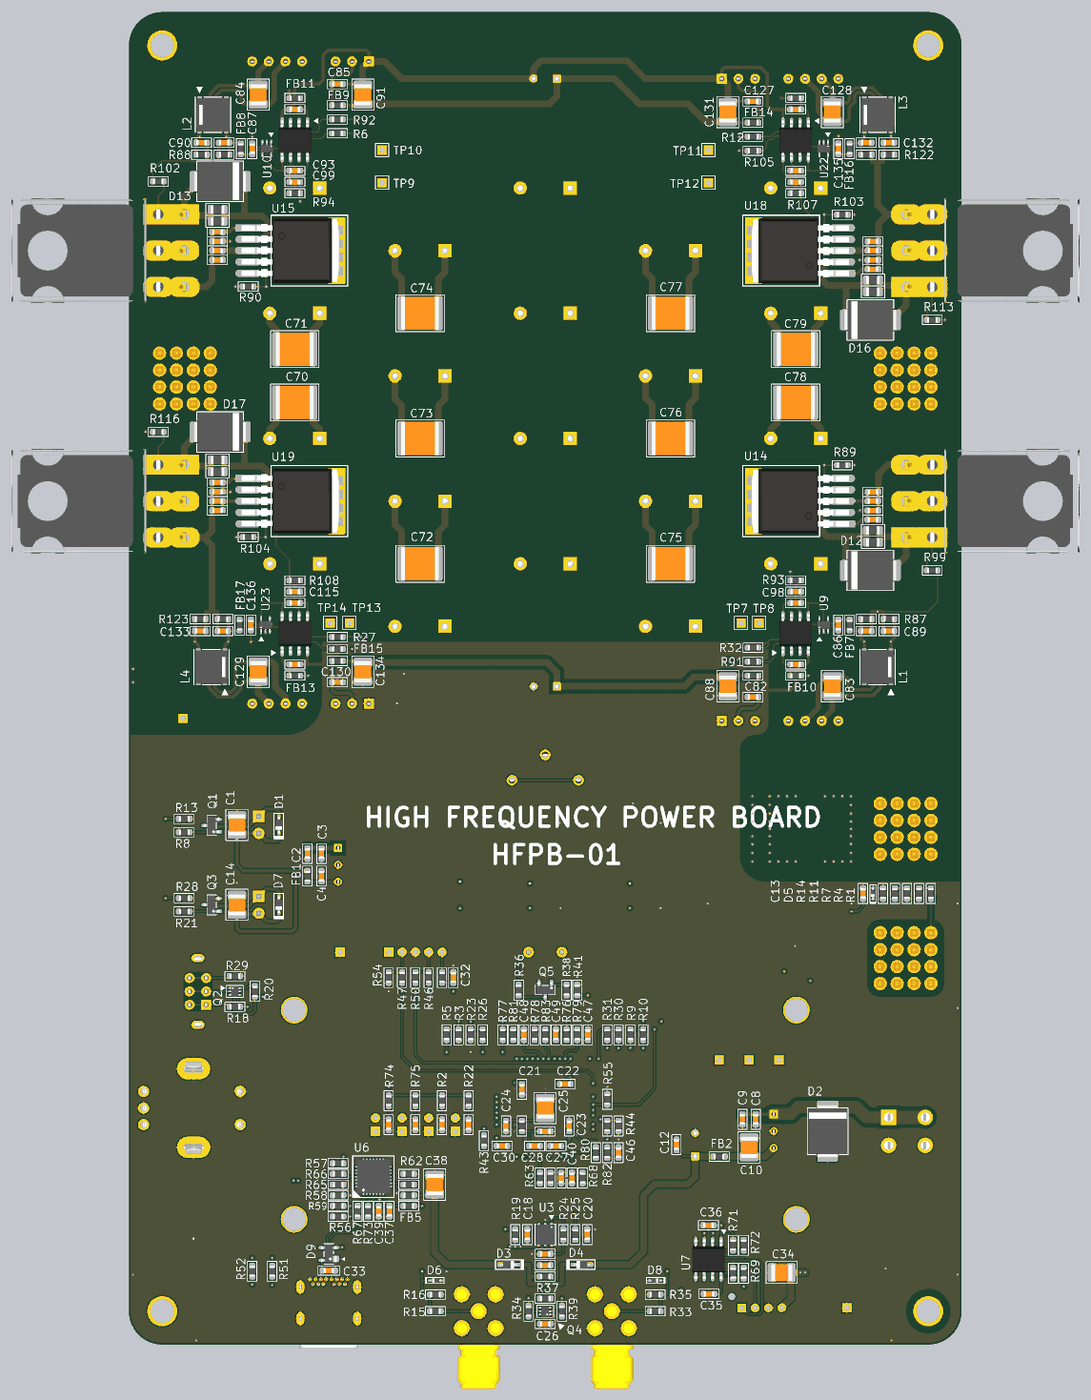
[diagram p12: 3D render of the assembled board from below, using the file's embedded part models]

## Layer stack, top to bottom
Top Solder: solder mask 0.01, Solder Resist, Dk 3.5
Top Layer: signal copper 0.035
Dielectric 1: core 0.2, FR-4, Dk 4.2
Signal Layer 1: signal copper 0.035
Dielectric 6: prepreg 0.15, Dk 4.2
Signal Layer 2: signal copper 0.035
Dielectric 5: core 0.2, FR-4, Dk 4.2
Signal Layer 3: signal copper 0.035
Dielectric 4: prepreg 0.15, Dk 4.2
Signal Layer 4: signal copper 0.035
Dielectric 7: core 0.2, FR-4, Dk 4.2
Signal Layer 5: signal copper 0.035
Dielectric 8: prepreg 0.15, Dk 4.2
Signal Layer 6: signal copper 0.035
Dielectric 2: core 0.2, FR-4, Dk 4.2
Bottom Layer: signal copper 0.035
Bottom Solder: solder mask 0.01, Solder Resist, Dk 3.5

## Board outline
0,5 0,195 cw(c5,195) 5,200 120,200 cw(c120,195) 125,195 125,5 cw(c120,5) 120,0 5,0 cw(c5,5)

## Design rules (kind name [scope] priority, off if disabled: settings)
BoardOutlineClearance [All] p1: gap=0.25 ignorepadtopadclearanceinfootprint=FALSE
Clearance Clearance_7 [InNet('NetR13_1')] p1: gap=0.4 ignorepadtopadclearanceinfootprint=FALSE
Clearance Clearance_6 [InNet('NetR31_1')] p2: gap=0.4 ignorepadtopadclearanceinfootprint=FALSE
Clearance Clearance_5 [InNet('Shield')] p3: gap=1.1 ignorepadtopadclearanceinfootprint=FALSE
Clearance Clearance_4 [InNet('+(15-30)V')] p4: gap=0.6 ignorepadtopadclearanceinfootprint=FALSE
Clearance Clearance_3 [InNet('+5V_3')] p5: gap=0.5 ignorepadtopadclearanceinfootprint=FALSE
Clearance Clearance_2 [InNet('+5V_1')] p6: gap=0.5 ignorepadtopadclearanceinfootprint=FALSE
Clearance Clearance_1 [InNet('+HV')] p7: gap=0.5 ignorepadtopadclearanceinfootprint=FALSE
Clearance [All] p8: gap=0.2 ignorepadtopadclearanceinfootprint=FALSE
DiffPairsRouting [All] p1: maxlimit=2 minlimit=0.2 mostfreqgap=0.2 toplayer_minwidth=0.2 toplayer_maxwidth=2 toplayer_prefwidth=0.2 midlayer1_minwidth=0.2 midlayer1_maxwidth=2 midlayer1_prefwidth=0.2 midlayer2_minwidth=0.2 midlayer2_maxwidth=2 midlayer2_prefwidth=0.2 midlayer3_minwidth=0.2 midlayer3_maxwidth=2 midlayer3_prefwidth=0.2 midlayer4_minwidth=0.2 midlayer4_maxwidth=2 midlayer4_prefwidth=0.2 midlayer5_minwidth=0.2 midlayer5_maxwidth=2 midlayer5_prefwidth=0.2 midlayer6_minwidth=0.2 midlayer6_maxwidth=2 midlayer6_prefwidth=0.2 bottomlayer_minwidth=0.2 bottomlayer_maxwidth=2 bottomlayer_prefwidth=0.2 maxuncoupledlength=12.7
Height [All] p1: minheight=0 maxheight=100 prefheight=12.7
HoleSize [All] p1: absolutevalues=TRUE maxlimit=8 minlimit=0.3 maxpercent=80.000 minpercent=20.000
HoleToHoleClearance [All] p1: gap=0.4 allowstackedmicrovias=TRUE
MinimumSolderMaskSliver [All] p1: minsoldermaskwidth=0.1
PlaneClearance [All] p1: clearance=0.5
PlaneConnect [All] p1: planeconnectstyle=Relief reliefexpansion=0.5 reliefentries=4 reliefconductorwidth=0.2 reliefairgap=0.2
PolygonConnect PolygonConnect_5 [HasFootprint('RESC670X720X125L115N')] p1: connectstyle=Direct reliefconductorwidth=0.254 reliefentries=4 polygonreliefangle="90 Angle" airgapwidth=0.254
PolygonConnect PolygonConnect_4 [HasFootprint('TO247-3 - SHORT PINS')] p2: connectstyle=Relief reliefconductorwidth=1 reliefentries=4 polygonreliefangle="90 Angle" airgapwidth=0.25
PolygonConnect PolygonConnect_3 [HasFootprint('TO247-3 - SGIB')] p3: connectstyle=Relief reliefconductorwidth=1 reliefentries=4 polygonreliefangle="90 Angle" airgapwidth=0.25
PolygonConnect PolygonConnect_2 [InNet('Shield')] p4: connectstyle=Direct reliefconductorwidth=0.254 reliefentries=4 polygonreliefangle="90 Angle" airgapwidth=0.254
PolygonConnect PolygonConnect_1 [IsVia] p5: connectstyle=Direct reliefconductorwidth=0.254 reliefentries=4 polygonreliefangle="90 Angle" airgapwidth=0.254
PolygonConnect [All] p6: connectstyle=Relief reliefconductorwidth=0.2 reliefentries=4 polygonreliefangle="90 Angle" airgapwidth=0.2
RoutingCorners [All] p1: cornerstyle=45-Degree minsetback=2.5 maxsetback=2.5
RoutingVias [All] p1: holewidth=0.3 width=0.6 viastyle="Through Hole" minholewidth=0.3 minwidth=0.6 maxholewidth=1 maxwidth=2
SilkToSilkClearance [All] p1: silktosilkclearance=0.1
SilkToSolderMaskClearance [IsPad] p1: minsilkscreentomaskgap=0.1 clearancetoexposedcopper=TRUE
SolderMaskExpansion [All] p1: expansion=0.05
Width [All] p1: maxlimit=8 minlimit=0.2 preferedwidth=0.2 minimp=50.000000 maximp=50.000000 favimp=50.000000
20 further rules are at their usual default settings.

## Classes and differential pairs
component class "HFPB_01, PAGE-1": BR1 BU1 BU2 BU3 BU4 C1 C2 C3 C4 C5 C6 C7 C8 C9 C10 C11 C12 C13 C14 C15 C16 C17 C18 C19 C20 C21 C22 C23 C24 C25 C26 C27 C28 C29 C30 C31 C32 C33 C34 C35 C36 C37 C38 C39 C40 C41 C42 C43 C44 C45 C46 C47 C48 C49 D1 D2 D3 D4 D5 D6 D7 D8 D9 FB1 FB2 FB3 FB4 FB5 H1 H2 H3 H4 LD1 LD2 LD3 LD4 LD5 LD6 LS1 Q1 Q2 Q3 Q4 Q5 R1 R2 R3 R4 R5 R6 R7 R8 R9 R10 R11 R12 R13 R14 R15 R16 R17 R18 R19 R20 R21 R22 R23 R24 R25 R26 R27 R28 R29 R30 R31 R32 R33 R34 R35 R36 R37 R38 R39 R40 R41 R42 R43 R44 R45 R46 R47 R48 R49 R50 R51 R52 R53 R54 R55 R56 R57 R58 R59 R60 R61 R62 R63 R64 R65 R66 R67 R68 R69 R70 R71 R72 R73 R74 R75 R76 R77 R78 R79 R80 R81 R82 R83 R84 RT1 RT2 RT3 RT4 SW1 TP1 TP2 TP3 TP4 TP5 TP6 U1 U2 U3 U4 U5 U6 U7 X1 X2 X3 X4 X5 X6 X7 X8 X9 Y1
component class "HFPB_01, PAGE-2": C50 C51 C52 C53 C54 C55 C56 C57 C58 C59 C60 C61 C62 C63 C64 C65 C66 C67 C68 C69 C70 C71 C72 C73 C74 C75 C76 C77 C78 C79 C80 C81 C82 C83 C84 C85 C86 C87 C88 C89 C90 C91 C92 C93 C94 C95 C96 C97 C98 C99 C100 C101 C102 C103 C104 C105 C106 C107 C108 C109 C110 C111 C112 C113 C114 C115 C116 C117 C118 C119 C120 C121 C122 C123 C124 C125 C126 C127 C128 C129 C130 C131 C132 C133 C134 C135 C136 D10 D11 D12 D13 D14 D15 D16 D17 FB6 FB7 FB8 FB9 FB10 FB11 FB12 FB13 FB14 FB15 FB16 FB17 L1 L2 L3 L4 Q6 Q7 Q8 Q9 Q10 Q11 Q12 Q13 R85 R86 R87 R88 R89 R90 R91 R92 R93 R94 R95 R96 R97 R98 R99 R100 R101 R102 R103 R104 R105 R106 R107 R108 R109 R110 R111 R112 R113 R114 R115 R116 R117 R118 R119 R120 R121 R122 R123 TP7 TP8 TP9 TP10 TP11 TP12 TP13 TP14 U8 U9 U10 U11 U12 U13 U14 U15 U16 U17 U18 U19 U20 U21 U22 U23 X10 X11 X12 X13
differential pair DP2: +DP2_P -DP2_N
differential pair DP1: +DP1_P -DP1_N

## Components (designator, comment, footprint, x,y, rotation, side; value= is the part's Value field where it differs from the comment)
BR1 "PEC11H-4020F-S0016" BOURNS_PEC11H 115.3,35.5 r90 top value="\"text\""
BU1 "1571563-8" TE_1571563-8 47.5,72 r90 top value="\"MC POWER OFF\""
BU2 "1571563-8" TE_1571563-8 77.5,72 r90 top value="\"BOOT\""
BU3 "1571563-8" TE_1571563-8 62.5,72 r90 top value="\"RESET\""
BU4 "1571563-8" TE_1571563-8 115.3,18.2 r180 top value="\"START/STOP\""
C1 "10uF" "CAPC320X250X280L60N - full legend" 108.8,78 r90 bottom
C2 "1uF" "CAPC160X80X80L35N - Full legend"#1 98.2,73.7 r270 bottom
C3 "0.1uF" "CAPC160X80X80L35N - Full legend"#1 96.1,73.7 r270 bottom
C4 "1uF" "CAPC160X80X80L35N - Full legend"#1 96.1,70.3 r90 bottom
C5 "100uF" CAPPRD350W60D850H900 62.5,190 r0 top
C6 "100uF" CAPPRD350W60D850H900 62.5,98.8 r0 top
C7 "0.01uF" "CAPC160X80X80L35N - Full legend"#1 78,33 r270 bottom
C8 "1uF" "CAPC160X80X80L35N - Full legend"#1 30.9,33.8 r270 bottom
C9 "0.1uF" "CAPC160X80X80L35N - Full legend"#1 32.9,33.8 r270 bottom
C10 "100uF" "CAPC320X250X280L60N - full legend" 31.9,29.6 r90 bottom
C11 "330uF" CAPPRD350W60D850H900 40,30 r90 top
C12 "1uF" "CAPC160X80X80L35N - Full legend"#1 42.8,30 r90 bottom
C13 "0.01uF" "CAPC160X80X80L35N - Full legend"#1 14.8,67.7 r90 bottom
C14 "10uF" "CAPC320X250X280L60N - full legend" 108.8,66 r90 bottom
C15 "0.01uF" "CAPC160X80X80L35N - Full legend"#1 60.1,25 r270 bottom
C16 "0.1uF" "CAPC160X80X80L35N - Full legend"#1 62.5,11.9 r0 bottom
C17 "1uF" "CAPC160X80X80L35N - Full legend"#1 62.5,13.6 r0 bottom
C18 "0.1uF" "CAPC160X80X80L35N - Full legend"#1 65.2,16.5 r90 bottom
C19 "0.01uF" "CAPC160X80X80L35N - Full legend"#1 74,33 r270 bottom
C20 "0.01uF" "CAPC160X80X80L35N - Full legend"#1 56.2,16.5 r90 bottom
C21 "1uF" "CAPC160X80X80L35N - Full legend"#1 66,38.3 r270 bottom
C22 "0.1uF" "CAPC160X80X80L35N - Full legend"#1 59.5,39.1 r0 bottom
C23 "0.1uF" "CAPC160X80X80L35N - Full legend"#1 58.9,32.8 r90 bottom
C24 "0.1uF" "CAPC160X80X80L35N - Full legend"#1 68.4,32.8 r270 bottom
C25 "100uF" "CAPC320X250X280L60N - full legend" 62.5,35.5 r90 bottom
C26 "0.01uF" "CAPC160X80X80L35N - Full legend"#1 62.5,3.1 r180 bottom
C27 "0.1uF" "CAPC160X80X80L35N - Full legend"#1 60.9,29.8 r0 bottom
C28 "1uF" "CAPC160X80X80L35N - Full legend"#1 64.1,29.8 r180 bottom
C29 "0.1uF" "CAPC160X80X80L35N - Full legend"#1 62.5,32 r180 bottom
C30 "0.01uF" "CAPC160X80X80L35N - Full legend"#1 69,29.8 r180 bottom
C31 "0.1uF" "CAPC160X80X80L35N - Full legend"#1 25,58 r90 top
C32 "0.1uF" "CAPC160X80X80L35N - Full legend"#1 76.3,55.1 r270 bottom
C33 "0.1uF" "CAPC160X80X80L35N - Full legend"#2 95,11.1 r180 bottom
C34 "100uF" "CAPC320X250X280L60N - full legend" 27,10.8 r0 bottom
C35 "0.1uF" "CAPC160X80X80L35N - Full legend"#1 37.9,7.6 r0 bottom
C36 "0.1uF" "CAPC160X80X80L35N - Full legend"#1 38,17.9 r0 bottom
C37 "0.1uF" "CAPC160X80X80L35N - Full legend"#1 85.9,20 r90 bottom
C38 "10uF" "CAPC320X250X280L60N - full legend" 79.1,24 r90 bottom
C39 "0.1uF" "CAPC160X80X80L35N - Full legend"#1 87.5,20 r90 bottom
C40 "0.01uF" "CAPC160X80X80L35N - Full legend"#1 58.5,25 r270 bottom
C41 "27pF" "CAPC160X80X80L35N - Full legend"#1 59.5,18.7 r0 top
C42 "27pF" "CAPC160X80X80L35N - Full legend"#1 65.5,18.7 r180 top
C43 "0.01uF" "CAPC160X80X80L35N - Full legend"#1 82,33 r270 bottom
C44 "0.1uF" "CAPC160X80X80L35N - Full legend"#1 10.5,9 r45 top
C45 "0.01uF" "CAPC160X80X80L35N - Full legend"#1 86,33 r270 bottom
C46 "0.01uF" "CAPC160X80X80L35N - Full legend"#1 51.5,28.8 r90 bottom
C47 "0.01uF" "CAPC160X80X80L35N - Full legend"#1 56.1,46.5 r90 bottom
C48 "0.01uF" "CAPC160X80X80L35N - Full legend"#1 65.7,46.5 r90 bottom
C49 "0.01uF" "CAPC160X80X80L35N - Full legend"#1 60.9,46.5 r90 bottom
C50 "680uF" CAPPRD750W80D1820H4200 24.9,173.6 r0 top
C51 "680uF" CAPPRD750W80D1820H4200 24.9,154.8 r0 top
C52 "680uF" CAPPRD750W80D1820H4200 24.9,136 r0 top
C53 "680uF" CAPPRD750W80D1820H4200 24.9,117.2 r0 top locked
C54 "680uF" CAPPRD750W80D1820H4200 43.7,164.2 r0 top
C55 "680uF" CAPPRD750W80D1820H4200 43.7,145.4 r0 top
C56 "680uF" CAPPRD750W80D1820H4200 43.7,126.6 r0 top
C57 "680uF" CAPPRD750W80D1820H4200 43.7,107.8 r0 top
C58 "680uF" CAPPRD750W80D1820H4200 62.5,173.6 r0 top
C59 "680uF" CAPPRD750W80D1820H4200 62.5,154.8 r0 top
C60 "680uF" CAPPRD750W80D1820H4200 62.5,136 r0 top
C61 "680uF" CAPPRD750W80D1820H4200 62.5,117.2 r0 top
C62 "680uF" CAPPRD750W80D1820H4200 81.3,164.2 r0 top
C63 "680uF" CAPPRD750W80D1820H4200 81.3,145.4 r0 top
C64 "680uF" CAPPRD750W80D1820H4200 81.3,126.6 r0 top
C65 "680uF" CAPPRD750W80D1820H4200 81.3,107.8 r0 top
C66 "680uF" CAPPRD750W80D1820H4200 100.1,173.6 r0 top
C67 "680uF" CAPPRD750W80D1820H4200 100.1,154.8 r0 top
C68 "680uF" CAPPRD750W80D1820H4200 100.1,136 r0 top
C69 "680uF" CAPPRD750W80D1820H4200 100.1,117.2 r0 top
C70 "1uF" CAPC570X500X160L60N 100.1,141.4 r0 bottom
C71 "1uF" CAPC570X500X160L60N 100.1,149.4 r0 bottom
C72 "1uF" CAPC570X500X160L60N 81.3,117.2 r0 bottom
C73 "1uF" CAPC570X500X160L60N 81.3,136 r0 bottom
C74 "1uF" CAPC570X500X160L60N 81.3,154.8 r0 bottom
C75 "1uF" CAPC570X500X160L60N 43.7,117.2 r0 bottom
C76 "1uF" CAPC570X500X160L60N 43.7,136 r0 bottom
C77 "1uF" CAPC570X500X160L60N 43.7,154.8 r0 bottom
C78 "1uF" CAPC570X500X160L60N 24.9,141.4 r0 bottom
C79 "1uF" CAPC570X500X160L60N 24.9,149.4 r0 bottom
C80 "1uF" "CAPC160X80X80L35N - Full legend"#1 14.3,107.1 r180 bottom
C81 "1uF" "CAPC160X80X80L35N - Full legend"#1 110.7,180.4 r0 bottom
C82 "1uF" "CAPC160X80X80L35N - Full legend"#1 31.3,97.2 r0 bottom
C83 "10uF" "CAPC320X250X280L60N - full legend" 19.4,98.8 r270 bottom
C84 "10uF" "CAPC320X250X280L60N - full legend" 105.6,187.6 r90 bottom
C85 "1uF" "CAPC160X80X80L35N - Full legend"#1 93.7,189.2 r180 bottom
C86 "0.1uF" "CAPC160X80X80L35N - Full legend"#1 18.5,108 r270 bottom
C87 "0.1uF" "CAPC160X80X80L35N - Full legend"#1 106.5,179.5 r90 bottom
C88 "10uF" "CAPC320X250X280L60N - full legend" 35.1,98.8 r270 bottom
C89 "2.2uF" "CAPC160X80X80L35N - Full legend"#1 10.9,107.1 r180 bottom
C90 "2.2uF" "CAPC160X80X80L35N - Full legend"#1 114.1,180.4 r0 bottom
C91 "10uF" "CAPC320X250X280L60N - full legend" 89.9,187.6 r90 bottom
C92 "0.1uF" "CAPC160X80X80L35N - Full legend"#1 24.9,111.3 r180 bottom
C93 "0.1uF" "CAPC160X80X80L35N - Full legend"#1 100.1,176.2 r0 bottom
C94 "0.01uF" "CAPC160X80X80L35N - Full legend"#1 24.9,102.1 r180 bottom
C95 "0.01uF" "CAPC160X80X80L35N - Full legend"#1 100.1,185.4 r0 bottom
C96 "220pF" CAPC450X320X140L60N 12.9,131.6 r90 top
C97 "220pF" CAPC450X320X140L60N 112.1,159.2 r270 top
C98 "10pF" "CAPC160X80X80L35N - Full legend"#1 24.9,113 r180 bottom
C99 "10pF" "CAPC160X80X80L35N - Full legend"#1 100.1,174.5 r0 bottom
C100 "1uF" "CAPC160X80X80L35N - Full legend"#1 13.3,125.2 r180 bottom
C101 "0.1uF" "CAPC160X80X80L35N - Full legend"#1 13.3,123.8 r180 bottom
C102 "0.1uF" "CAPC160X80X80L35N - Full legend"#1 111.7,167 r0 bottom
C103 "1uF" "CAPC160X80X80L35N - Full legend"#1 111.7,165.6 r0 bottom
C104 "2.2uF" "CAPC160X80X80L35N - Full legend"#1 13.3,126.6 r0 bottom
C105 "0.1uF" "CAPC160X80X80L35N - Full legend"#1 13.3,128 r0 bottom
C106 "0.1uF" "CAPC160X80X80L35N - Full legend"#1 111.7,164.2 r180 bottom
C107 "2.2uF" "CAPC160X80X80L35N - Full legend"#1 111.7,162.8 r180 bottom
C108 "0.1uF" "CAPC160X80X80L35N - Full legend"#1 24.9,176.2 r0 bottom
C109 "0.1uF" "CAPC160X80X80L35N - Full legend"#1 100.1,111.3 r180 bottom
C110 "0.01uF" "CAPC160X80X80L35N - Full legend"#1 24.9,185.4 r0 bottom
C111 "0.01uF" "CAPC160X80X80L35N - Full legend"#1 100.1,102.1 r180 bottom
C112 "220pF" CAPC450X320X140L60N 12.9,169.2 r90 top
C113 "220pF" CAPC450X320X140L60N 112.1,121.55 r270 top
C114 "10pF" "CAPC160X80X80L35N - Full legend"#1 24.9,174.5 r0 bottom
C115 "10pF" "CAPC160X80X80L35N - Full legend"#1 100.1,113 r180 bottom
C116 "1uF" "CAPC160X80X80L35N - Full legend"#1 13.3,162.8 r180 bottom
C117 "0.1uF" "CAPC160X80X80L35N - Full legend"#1 13.3,161.4 r180 bottom
C118 "0.1uF" "CAPC160X80X80L35N - Full legend"#1 111.7,128 r0 bottom
C119 "1uF" "CAPC160X80X80L35N - Full legend"#1 111.7,129.4 r0 bottom
C120 "2.2uF" "CAPC160X80X80L35N - Full legend"#1 13.3,164.2 r0 bottom
C121 "0.1uF" "CAPC160X80X80L35N - Full legend"#1 13.3,165.6 r0 bottom
C122 "0.1uF" "CAPC160X80X80L35N - Full legend"#1 111.7,125.2 r180 bottom
C123 "2.2uF" "CAPC160X80X80L35N - Full legend"#1 111.7,126.6 r180 bottom
C124 "0.01uF" "CAPC160X80X80L35N - Full legend"#1 22.7,63.5 r180 top
C125 "1uF" "CAPC160X80X80L35N - Full legend"#1 14.3,180.4 r180 bottom
C126 "1uF" "CAPC160X80X80L35N - Full legend"#1 110.9,107.1 r0 bottom
C127 "1uF" "CAPC160X80X80L35N - Full legend"#1 31.3,186.6 r0 bottom
C128 "10uF" "CAPC320X250X280L60N - full legend" 19.4,185 r90 bottom
C129 "10uF" "CAPC320X250X280L60N - full legend" 105.6,101 r270 bottom
C130 "1uF" "CAPC160X80X80L35N - Full legend"#1 93.7,99.4 r180 bottom
C131 "10uF" "CAPC320X250X280L60N - full legend" 35.1,185 r90 bottom
C132 "2.2uF" "CAPC160X80X80L35N - Full legend"#1 10.9,180.4 r180 bottom
C133 "2.2uF" "CAPC160X80X80L35N - Full legend"#1 114.3,107.1 r0 bottom
C134 "10uF" "CAPC320X250X280L60N - full legend" 89.9,101 r270 bottom
C135 "0.1uF" "CAPC160X80X80L35N - Full legend"#1 18.5,179.5 r90 bottom
C136 "0.1uF" "CAPC160X80X80L35N - Full legend"#1 106.7,108 r270 bottom
D1 "BAT54J,115" SODFL250X125X80L40X32N 102.5,78 r90 bottom value=30V
D2 "MBRS540T3G" DIOM795X585X240L100X300N 20.1,32 r270 bottom value=40V
D3 "BAT60JFILM" SOD250X125X110L30X32N 68,12 r0 bottom value=10V
D4 "BAT60JFILM" SOD250X125X110L30X32N 57,12 r180 bottom value=10V
D5 "D1213A-01T-7" SODFL160X80X65L30X30N 13.3,67.7 r90 bottom value=Vst=3.3V
D6 "D1213A-01T-7" SODFL160X80X65L30X30N 79,9.6 r180 bottom value=Vst=3.3V
D7 "BAT54J,115" SODFL250X125X80L40X32N 102.5,66 r90 bottom value=30V
D8 "D1213A-01T-7" SODFL160X80X65L30X30N 46,9.6 r0 bottom value=Vst=3.3V
D9 "TPD2E001DZDR" SOT143-4P192_237X122L40X40N 95,13.6 r90 bottom value=Vst=5.5V
D10 "BAT54J,115" SODFL250X125X80L40X32N 13.1,123.3 r270 top value=30V
D11 "BAT54J,115" SODFL250X125X80L40X32N 111.9,167.5 r90 top value=30V
D12 "MBRS540T3G" DIOM795X585X240L100X300N 13.7,116.2 r180 bottom value=40V
D13 "MBRS540T3G" DIOM795X585X240L100X300N 111.3,174.6 r0 bottom value=40V
D14 "BAT54J,115" SODFL250X125X80L40X32N 13.1,160.9 r270 top value=30V
D15 "BAT54J,115" SODFL250X125X80L40X32N 111.9,129.9 r90 top value=30V
D16 "MBRS540T3G" DIOM795X585X240L100X300N 13.7,153.8 r180 bottom value=40V
D17 "MBRS540T3G" DIOM795X585X240L100X300N 111.3,137 r0 bottom value=40V
FB1 "600Ohms" BEADC160X80X80L30N 98.2,70.3 r270 bottom
FB2 "600Ohms" BEADC160X80X80L30N 36.4,28.2 r180 bottom
FB3 "600Ohms" BEADC160X80X80L30N 62.5,10.2 r0 bottom
FB4 "600Ohms" BEADC160X80X80L30N 66,32.8 r270 bottom
FB5 "600Ohms" BEADC160X80X80L30N 83,20.8 r0 bottom
FB6 "600Ohms" BEADC160X80X80L30N 31.3,100.4 r180 bottom
FB7 "600Ohms" BEADC160X80X80L30N 16.8,108 r90 bottom
FB8 "600Ohms" BEADC160X80X80L30N 108.2,179.5 r270 bottom
FB9 "600Ohms" BEADC160X80X80L30N 93.7,186 r0 bottom
FB10 "600Ohms" BEADC160X80X80L30N 24.9,100.4 r0 bottom
FB11 "600Ohms" BEADC160X80X80L30N 100.1,187.1 r180 bottom
FB12 "600Ohms" BEADC160X80X80L30N 24.9,187.1 r180 bottom
FB13 "600Ohms" BEADC160X80X80L30N 100.1,100.4 r0 bottom
FB14 "600Ohms" BEADC160X80X80L30N 31.3,183.4 r180 bottom
FB15 "600Ohms" BEADC160X80X80L30N 93.7,102.6 r0 bottom
FB16 "600Ohms" BEADC160X80X80L30N 16.8,179.5 r270 bottom
FB17 "600Ohms" BEADC160X80X80L30N 108.4,108 r90 bottom
H1 "" HOLE/3.5/4.5-O 5,5 r90 top
H2 "" HOLE/3.5/4.5-O 5,195 r90 top
H3 "" HOLE/3.5/4.5-O 120,195 r90 top
H4 "" HOLE/3.5/4.5-O 120,5 r90 top
L1 "DLW5BTM142TQ2L" MURATA_DLW5BTM142TQ2L 12.6,101.7 r270 bottom value=1.4kOhm
L2 "DLW5BTM142TQ2L" MURATA_DLW5BTM142TQ2L 112.4,184.6 r90 bottom value=1.4kOhm
L3 "DLW5BTM142TQ2L" MURATA_DLW5BTM142TQ2L 12.6,184.6 r90 bottom value=1.4kOhm
L4 "DLW5BTM142TQ2L" MURATA_DLW5BTM142TQ2L 112.6,101.7 r270 bottom value=1.4kOhm
LD1 "LTST-C193KGKT-5A" LEDC160X80X40L30N 42.1,6.5 r90 top value=Green
LD2 "LTST-C193KSKT-5A" LEDC160X80X40L30N 62.5,6.5 r90 top value=Yellow
LD3 "LTST-C194KFKT" LEDC160X80X40L30N 103.499,6.5 r90 top value=Orange
LD4 "LTST-C193KRKT-5A" LEDC160X80X40L30N 106.499,6.5 r90 top value=Red
LD5 "LTST-C193KSKT-5A" LEDC160X80X40L30N 83.4,6.5 r270 top value=Yellow
LD6 "LTST-C193KSKT-5A" LEDC160X80X40L30N 86.7,6.5 r270 top value=Yellow
LS1 "CMI-9605IC-0580T" CUI_CMI-9605IC-0580T 62.5,58.9 r90 top
Q1 "IRLML6244TRPBF" SOT23-3P95_235X110L50X40N 112.6,77.9 r90 bottom
Q2 "DMC2400UV-7" TRXSOFL6P50_160X162X60L20X22N 109.1,53 r270 bottom
Q3 "IRLML6244TRPBF" SOT23-3P95_235X110L50X40N 112.6,66 r90 bottom
Q4 "DMC2400UV-7" TRXSOFL6P50_160X162X60L20X22N 62.5,5 r90 bottom
Q5 "IRLML6244TRPBF" SOT23-3P95_235X110L50X40N 62.5,53.2 r0 bottom
Q6 "IXTH240N15X4" "TO247-3 - SGIB" 8.3,126.6 r90 top
Q7 "IXTH240N15X4" "TO247-3 - SHORT PINS" 4.4,126.6 r90 top
Q8 "IXTH240N15X4" "TO247-3 - SHORT PINS" 120.6,164.2 r270 top
Q9 "IXTH240N15X4" "TO247-3 - SGIB" 116.7,164.2 r270 top
Q10 "IXTH240N15X4" "TO247-3 - SGIB" 8.3,164.2 r90 top
Q11 "IXTH240N15X4" "TO247-3 - SHORT PINS" 4.4,164.2 r90 top
Q12 "IXTH240N15X4" "TO247-3 - SHORT PINS" 120.6,126.6 r270 top
Q13 "IXTH240N15X4" "TO247-3 - SGIB" 116.7,126.6 r270 top
R1 "10k" "RESC160X80X55L30N - Full legend" 4.6,67.7 r270 bottom
R2 "1k" "RESC160X80X55L30N - Full legend" 78,36.6 r90 bottom
R3 "1k" "RESC160X80X55L30N - Full legend" 75.5,46.5 r90 bottom
R4 "10k" "RESC160X80X55L30N - Full legend" 6.4,67.7 r90 bottom
R5 "non/non/10R" "RESC160X80X55L30N - Full legend" 77.3,46.5 r90 bottom
R6 "1k" "RESC160X80X55L30N - Full legend" 93.7,181.8 r0 bottom
R7 "10k" "RESC160X80X55L30N - Full legend" 8.2,67.7 r270 bottom
R8 "1k" "RESC160X80X55L30N - Full legend" 116.7,76.9 r180 bottom
R9 "10R/10R/non" "RESC160X80X55L30N - Full legend" 49.7,46.5 r270 bottom
R10 "10R/non/10R" "RESC160X80X55L30N - Full legend" 47.8,46.5 r90 bottom
R11 "10k" "RESC160X80X55L30N - Full legend" 10,67.7 r90 bottom
R12 "1k" "RESC160X80X55L30N - Full legend" 31.3,181.3 r180 bottom
R13 "10k" "RESC160X80X55L30N - Full legend" 116.7,78.9 r0 bottom
R14 "1k" "RESC160X80X55L30N - Full legend" 11.8,67.7 r270 bottom
R15 "non/10R/non" "RESC160X80X55L30N - Full legend" 79,5 r0 bottom
R16 "1k" "RESC160X80X55L30N - Full legend" 79,7.5 r180 bottom
R17 "1k" "RESC160X80X55L30N - Full legend" 61.7,25 r90 bottom
R18 "10R" "RESC160X80X55L30N - Full legend" 109.1,50.7 r180 bottom
R19 "200" "RESC160X80X55L30N - Full legend" 67,16.5 r90 bottom
R20 "10R" "RESC160X80X55L30N - Full legend" 106.1,53 r270 bottom
R21 "1k" "RESC160X80X55L30N - Full legend" 116.7,65 r180 bottom
R22 "1k" "RESC160X80X55L30N - Full legend" 74,36.6 r90 bottom
R23 "1k" "RESC160X80X55L30N - Full legend" 73.7,46.5 r90 bottom
R24 "10k" "RESC160X80X55L30N - Full legend" 59.8,16.5 r90 bottom
R25 "100" "RESC160X80X55L30N - Full legend" 58,16.5 r270 bottom
R26 "non/non/10R" "RESC160X80X55L30N - Full legend" 71.9,46.5 r90 bottom
R27 "1k" "RESC160X80X55L30N - Full legend" 93.7,104.4 r0 bottom
R28 "10k" "RESC160X80X55L30N - Full legend" 116.7,67 r0 bottom
R29 "10R" "RESC160X80X55L30N - Full legend" 109.1,55.3 r180 bottom
R30 "10R/10R/non" "RESC160X80X55L30N - Full legend" 51.5,46.5 r270 bottom
R31 "10R/non/10R" "RESC160X80X55L30N - Full legend" 53.2,46.5 r90 bottom
R32 "1k" "RESC160X80X55L30N - Full legend" 31.3,104.6 r180 bottom
R33 "non/10R/non" "RESC160X80X55L30N - Full legend" 46,5 r180 bottom
R34 "1M" "RESC160X80X55L30N - Full legend" 65,5 r270 bottom
R35 "1k" "RESC160X80X55L30N - Full legend" 46,7.5 r0 bottom
R36 "100" "RESC160X80X55L30N - Full legend" 66.5,53.2 r270 bottom
R37 "200" "RESC160X80X55L30N - Full legend" 62.5,6.9 r0 bottom
R38 "1k" "RESC160X80X55L30N - Full legend" 59.3,53.2 r90 bottom
R39 "1k" "RESC160X80X55L30N - Full legend" 60,5 r270 bottom
R40 "100" "RESC160X80X55L30N - Full legend" 53.2,32.8 r270 bottom
R41 "10k" "RESC160X80X55L30N - Full legend" 57.7,53.2 r270 bottom
R42 "10k" "RESC160X80X55L30N - Full legend" 26.6,58 r270 top
R43 "1k" "RESC160X80X55L30N - Full legend" 71.7,30.6 r90 bottom
R44 "10k" "RESC160X80X55L30N - Full legend" 51.5,32.8 r90 bottom
R45 "100" "RESC160X80X55L30N - Full legend" 22.7,61.8 r0 top
R46 "10k" "RESC160X80X55L30N - Full legend" 80,55.1 r270 bottom
R47 "100" "RESC160X80X55L30N - Full legend" 84,55.1 r270 bottom
R48 "2.2k" "RESC160X80X55L30N - Full legend" 20.4,58 r270 top
R49 "100" "RESC160X80X55L30N - Full legend" 18.8,58 r270 top
R50 "100" "RESC160X80X55L30N - Full legend" 82,55.1 r270 bottom
R51 "200" "RESC160X80X55L30N - Full legend" 103.5,11 r270 bottom
R52 "200" "RESC160X80X55L30N - Full legend" 106.5,11 r270 bottom
R53 "100" "RESC160X80X55L30N - Full legend" 78,55.1 r270 bottom
R54 "10k" "RESC160X80X55L30N - Full legend" 86,55.1 r90 bottom
R55 "1k" "RESC160X80X55L30N - Full legend" 53.2,36.8 r90 bottom
R56 "200" "RESC160X80X55L30N - Full legend" 93.6,19.2 r0 bottom
R57 "10k" "RESC160X80X55L30N - Full legend" 93.6,27.2 r180 bottom
R58 "10k" "RESC160X80X55L30N - Full legend" 93.6,22.4 r0 bottom
R59 "200" "RESC160X80X55L30N - Full legend" 93.6,20.8 r0 bottom
R60 "22k" "RESC160X80X55L30N - Full legend" 83,22.4 r0 bottom
R61 "10k" "RESC160X80X55L30N - Full legend" 83,24 r0 bottom
R62 "43k" "RESC160X80X55L30N - Full legend" 83,25.6 r180 bottom
R63 "100" "RESC160X80X55L30N - Full legend" 63.3,25 r90 bottom
R64 "100" "RESC160X80X55L30N - Full legend" 62.5,26.3 r180 top
R65 "200" "RESC160X80X55L30N - Full legend" 93.6,24 r0 bottom
R66 "200" "RESC160X80X55L30N - Full legend" 93.6,25.6 r0 bottom
R67 "100" "RESC160X80X55L30N - Full legend" 90.7,20 r90 bottom
R68 "1k" "RESC160X80X55L30N - Full legend" 56.9,25 r270 bottom
R69 "3.3k" "RESC160X80X55L30N - Full legend" 32.7,10.7 r270 bottom
R70 "3.3k" "RESC160X80X55L30N - Full legend" 34.3,10.7 r270 bottom
R71 "3.3k" "RESC160X80X55L30N - Full legend" 34.3,14.9 r90 bottom
R72 "3.3k" "RESC160X80X55L30N - Full legend" 32.7,14.9 r90 bottom
R73 "100" "RESC160X80X55L30N - Full legend" 89.1,20 r90 bottom
R74 "1k" "RESC160X80X55L30N - Full legend" 86,36.6 r90 bottom
R75 "1k" "RESC160X80X55L30N - Full legend" 82,36.6 r90 bottom
R76 "10k" "RESC160X80X55L30N - Full legend" 59.3,46.5 r270 bottom
R77 "10k" "RESC160X80X55L30N - Full legend" 68.9,46.5 r270 bottom
R78 "10k" "RESC160X80X55L30N - Full legend" 64.1,46.5 r270 bottom
R79 "10k" "RESC160X80X55L30N - Full legend" 57.7,46.5 r270 bottom
R80 "10k" "RESC160X80X55L30N - Full legend" 54.9,28.8 r90 bottom
R81 "10k" "RESC160X80X55L30N - Full legend" 67.3,46.5 r270 bottom
R82 "100" "RESC160X80X55L30N - Full legend" 53.2,28.8 r270 bottom
R83 "10k" "RESC160X80X55L30N - Full legend" 62.5,46.5 r270 bottom
R84 "100" "RESC160X80X55L30N - Full legend" 9,10.5 r45 top
R85 "10k" "RESC160X80X55L30N - Full legend" 14.3,108.9 r0 bottom
R86 "10k" "RESC160X80X55L30N - Full legend" 110.7,178.6 r180 bottom
R87 "5.1k" "RESC160X80X55L30N - Full legend" 10.9,108.9 r0 bottom
R88 "5.1k" "RESC160X80X55L30N - Full legend" 114.1,178.6 r180 bottom
R89 "1k" "RESC160X80X55L30N - Full legend" 17.9,132 r180 bottom
R90 "1k" "RESC160X80X55L30N - Full legend" 107.1,158.8 r180 bottom
R91 "1k" "RESC160X80X55L30N - Full legend" 31.3,102.5 r180 bottom
R92 "1k" "RESC160X80X55L30N - Full legend" 93.7,183.9 r0 bottom
R93 "100" "RESC160X80X55L30N - Full legend" 24.9,114.7 r0 bottom
R94 "100" "RESC160X80X55L30N - Full legend" 100.1,172.8 r0 bottom
R95 "1" "RESC200X125X70L40N - full legend" 13.3,120.4 r180 bottom
R96 "1" "RESC200X125X70L40N - full legend" 111.7,168.6 r180 bottom
R97 "1" "RESC200X125X70L40N - full legend" 13.3,122.2 r180 bottom
R98 "1" "RESC200X125X70L40N - full legend" 111.7,170.4 r180 bottom
R99 "10k" "RESC160X80X55L30N - Full legend" 4.4,116.2 r0 bottom
R100 "51" RESC640X320X70L60N 7.1,136.5 r0 top
R101 "51" RESC640X320X70L60N 117.9,154.3 r180 top
R102 "10k" "RESC160X80X55L30N - Full legend" 120.6,174.6 r180 bottom
R103 "1k" "RESC160X80X55L30N - Full legend" 17.9,169.6 r180 bottom
R104 "1k" "RESC160X80X55L30N - Full legend" 107.1,121.2 r180 bottom
R105 "1k" "RESC160X80X55L30N - Full legend" 31.3,179.2 r180 bottom
R106 "1k" "RESC160X80X55L30N - Full legend" 93.7,106.2 r0 bottom
R107 "100" "RESC160X80X55L30N - Full legend" 24.9,172.8 r180 bottom
R108 "100" "RESC160X80X55L30N - Full legend" 100.1,114.7 r180 bottom
R109 "1" "RESC200X125X70L40N - full legend" 13.3,158 r180 bottom
R110 "1" "RESC200X125X70L40N - full legend" 111.7,132.8 r180 bottom
R111 "1" "RESC200X125X70L40N - full legend" 13.3,159.8 r180 bottom
R112 "1" "RESC200X125X70L40N - full legend" 111.7,131 r180 bottom
R113 "10k" "RESC160X80X55L30N - Full legend" 4.4,153.8 r0 bottom
R114 "51" RESC640X320X70L60N 7.1,174.1 r0 top
R115 "51" RESC640X320X70L60N 117.9,116.7 r180 top
R116 "10k" "RESC160X80X55L30N - Full legend" 120.6,137 r180 bottom
R117 "100" "RESC160X80X55L30N - Full legend" 26.2,67.4 r270 top
R118 "5mOhms" RESC670X720X125L115N 22.7,77.4 r0 top
R119 "10k" "RESC160X80X55L30N - Full legend" 14.3,178.6 r0 bottom
R120 "10k" "RESC160X80X55L30N - Full legend" 110.9,108.9 r180 bottom
R121 "0" "RESC200X125X70L40N - full legend" 19.2,67.4 r90 top
R122 "5.1k" "RESC160X80X55L30N - Full legend" 10.9,178.6 r0 bottom
R123 "5.1k" "RESC160X80X55L30N - Full legend" 114.3,108.9 r180 bottom
RT1 "10k" "NTC - Through hole" 80,33 r90 top
RT2 "10k" "NTC - Through hole" 76,33 r90 top
RT3 "10k" "NTC - Through hole" 88,33 r90 top
RT4 "10k" "NTC - Through hole" 84,33 r90 top
SW1 "EG2208A" SK22D07 114.65,53 r90 top value="\"text\""
TP1 "NC" HOLE/0.8/1.4-R 27.4,42.7 r270 top
TP2 "NC" HOLE/0.8/1.4-R 31.9,42.7 r270 top
TP3 "NC" HOLE/0.8/1.4-R 36.4,42.7 r270 top
TP4 "GND" HOLE/0.8/1.4-R 93.3,58.9 r90 top
TP5 "GND" HOLE/0.8/1.4-R 17.2,5.5 r90 top
TP6 "GND" HOLE/0.8/1.4-R 116.9,94 r90 top
TP7 "NC" HOLE/0.8/1.4-R 33.1,108.3 r90 bottom
TP8 "NC" HOLE/0.8/1.4-R 30.4,108.3 r90 bottom
TP9 "NC" HOLE/0.8/1.4-R 87,174.4 r90 bottom
TP10 "NC" HOLE/0.8/1.4-R 87,179.3 r90 bottom
TP11 "NC" HOLE/0.8/1.4-R 38,179.3 r90 bottom
TP12 "NC" HOLE/0.8/1.4-R 38,174.4 r90 bottom
TP13 "NC" HOLE/0.8/1.4-R 91.9,108.3 r90 bottom
TP14 "NC" HOLE/0.8/1.4-R 94.8,108.3 r90 bottom
U1 "TSR 1-24120" SIP800W50P254L1220H1010Q3 93.6,72 r270 top
U2 "TSR 1-2450" SIP800W50P254L1220H1010Q3 28.2,32.04 r270 top
U3 "LD39050PU33R" SON7P95_300X300X100L40X35T235X165N 62.5,16.5 r0 bottom
U4 "STM32F334R8T7" QFP64P50_1200X1200X160L60X22N 62.5,35.5 r0 top
U5 "AD8628AUJZ" SOT23-5P95_280X145L45X40N 22.7,58 r180 top
U6 "CP2102-GM" QFN29P50_500X500X100L55X23T315N 88.3,25.2 r180 bottom
U7 "ISO1540D" SOIC-8 38,12.8 r0 bottom
U8 "EC4SAW-24S15N" SIP950W50P254L2200H1150Q8 36,93.6 r180 top
U9 "TPS71550DCKR" SOT23-5P65_210X110L36X22N 20.7,108 r180 bottom
U10 "TPS71550DCKR" SOT23-5P65_210X110L36X22N 104.3,179.5 r0 bottom
U11 "EC4SAW-24S15N" SIP950W50P254L2200H1150Q8 89,192.6 r0 top
U12 "SI8620BC-B-ISR" SOIC-8 24.9,106.7 r180 bottom
U13 "SI8620BC-B-ISR" SOIC-8 100.1,180.8 r0 bottom
U14 "IXDD614YI" DPAK6P170_1524X482L228X75T770X800N 24.2,126.6 r90 bottom
U15 "IXDD614YI" DPAK6P170_1524X482L228X75T770X800N 100.8,164.2 r270 bottom
U16 "SI8620BC-B-ISR" SOIC-8 24.9,180.8 r0 bottom
U17 "SI8620BC-B-ISR" SOIC-8 100.1,106.7 r180 bottom
U18 "IXDD614YI" DPAK6P170_1524X482L228X75T770X800N 24.2,164.2 r90 bottom
U19 "IXDD614YI" DPAK6P170_1524X482L228X75T770X800N 100.8,126.6 r270 bottom
U20 "EC4SAW-24S15N" SIP950W50P254L2200H1150Q8 36,190 r180 top
U21 "EC4SAW-24S15N" SIP950W50P254L2200H1150Q8 89,96.2 r0 top
U22 "TPS71550DCKR" SOT23-5P65_210X110L36X22N 20.7,179.5 r0 bottom
U23 "TPS71550DCKR" SOT23-5P65_210X110L36X22N 104.5,108 r180 bottom
X1 "0039281043" Molex_0039281043 8.4,32 r270 top
X2 "WF-2R" WF-02MR 105.5,78 r270 top
X3 "SMA-J-P-H-RA-TH1" Samtec_SMA-J-P-H-RA-TH1 72.5,5 r180 top
X4 "WF-2R" WF-02MR 105.5,66 r270 top
X5 "SMA-J-P-H-RA-TH1" Samtec_SMA-J-P-H-RA-TH1 52.5,5 r180 top
X6 "1074" Keystone-1074 62.5,86.6 r180 top
X7 "SWD" Molex-0510150500 82,58.9 r180 top
X8 "SS-52400-003" BELFUSE_SS-52400-003 95,3.9 r0 top
X9 "B04B-PASK-1(LF)(SN)" JST_B04B-PASK-1 30,5.5 r180 top
X10 "7461097" WURTH_7461097 8.4,58 r0 top
X11 "7461097" WURTH_7461097 8.4,77.4 r0 top
X12 "7461097" WURTH_7461097 8.4,145 r0 top
X13 "7461097" WURTH_7461097 116.6,145 r0 top
Y1 "8MHz" XTAL1140X470X430D1310L435X63N 62.5,22.7 r0 top

## Footprints (in the part's own frame and the unit in brackets; to place one, negate y for a bottom-side part, rotate by r counter-clockwise, add the part's x,y. Pads: shape width x height; smd on the part's side, far side on the other; paste and mask are expansions set on the pad)
BEADC160X80X80L30N [mm] "Ferrite Bead, Chip; 1.60 mm L X 0.80 mm W X 0.80 mm H body"
  rrect51% 0.9x0.9 smd: 1(-0.8,0) 2(0.8,0)
  silkscreen extent -1.5,-0.7 1.5,0.7, body extent -0.8,-0.4 0.8,0.4, height 0.8
BELFUSE_SS-52400-003 [mm]
  rect 0.3x1.2 smd: A1(-2.75,7.23)
  oval 0.3x1.2 smd: A2(-2.25,7.23) A3(-1.75,7.23) A4(-1.25,7.23) A5(-0.75,7.23) A6(-0.25,7.23) A7(0.25,7.23) A8(0.75,7.23) A9(1.25,7.23) A10(1.75,7.23) A11(2.25,7.23) A12(2.75,7.23)
  round 0.6 hole 0.35: B1(2.8,5.88) B2(2.4,5.17) B3(1.6,5.17) B4(1.2,5.88) B5(0.8,5.17) B6(0.4,5.88) B7(-0.4,5.88) B8(-0.8,5.17) B9(-1.2,5.88) B10(-1.6,5.17) B11(-2.4,5.17) B12(-2.8,5.88) G1(2,5.88) G2(-2,5.88)
  rect 0.2x1 smd: G3(0,2.55) G4(0,-0.55)
  oval 1.2x2 hole 0.4 slot 1 at 90 deg: S1(-4.27,4.73) S2(4.27,4.73) S3(-4.27,0) S4(4.27,0)
  silkscreen extent -4.38,-3.45 4.38,8.99, body extent -4.37,-4.42 4.37,7.41, height 2.96
BOURNS_PEC11H [mm]
  oval 3.2x5 hole 1.2 slot 3 at 90 deg: 0(-5.9,0) 0(5.9,0)
  round 1.7 hole 1: A(-2.5,-7.5) B(2.5,-7.5) C(0,-7.5) S(-2.5,7) W(2.5,7)
  silkscreen extent -6.25,-6.7 6.25,6.7, body extent -6.92,-7.6 6.92,7.1, height 21.6
"CAPC160X80X80L35N - Full legend"#1 [mm] "Capacitor, Chip; 1.60 mm L X 0.80 mm W X 0.80 mm H body"
  rrect51% 0.9x0.9 smd: 1(-0.8,0) 2(0.8,0)
  silkscreen extent -1.5,-0.7 1.5,0.7, body extent -0.8,-0.4 0.8,0.4, height 0.8
"CAPC160X80X80L35N - Full legend"#2 [mm] "Capacitor, Chip; 1.60 mm L X 0.80 mm W X 0.80 mm H body"
  rrect51% 0.9x0.9 smd: 1(-0.95,0) 2(0.95,0)
  silkscreen extent -1.6,-0.7 1.6,0.7, body extent -0.8,-0.4 0.8,0.4, height 0.8
"CAPC320X250X280L60N - full legend" [mm] "Capacitor, Chip; 3.20 mm L X 2.50 mm W X 2.80 mm H body"
  rrect36% 1.4x2.8 smd: 1(-1.4,0) 2(1.4,0)
  silkscreen extent -2.35,-1.65 2.35,1.65, body extent -1.6,-1.25 1.6,1.25, height 2.8
CAPC450X320X140L60N [mm] "Capacitor, Chip; 4.50 mm L X 3.20 mm W X 1.40 mm H body"
  rrect43% 1.3x3.1 smd: 1(-2.1,0) 2(2.1,0)
  silkscreen extent -3,-1.8 3.05,1.8, body extent -2.25,-1.6 2.25,1.6, height 1.4
CAPC570X500X160L60N [mm] "Capacitor, Chip; 5.70 mm L X 5.00 mm W X 1.60 mm H body"
  rrect40% 1.3x5.1 smd: 1(-2.75,0) 2(2.75,0)
  silkscreen extent -3.62,-2.78 3.62,2.78, body extent -2.85,-2.5 2.85,2.5, height 1.6
CAPPRD350W60D850H900 [mm] "Capacitor, Polarized, Radial (Electrolytic); 3.50 mm C X 8.50 mm Dia X 9.00 mm H body"
  round 1.2 hole 0.8 paste-1.2: N(1.75,0)
  rect 1.2x1.2 hole 0.8 paste-1.2: P(-1.75,0)
  silkscreen extent -4.25,-4.25 4.25,4.25, body extent -4.25,-4.25 4.26,4.25, height 9.01
CAPPRD750W80D1820H4200 [mm] "Capacitor, Polarized, Radial (Electrolytic); 7.50 mm C X 18.20 mm Dia X 42.00 mm H body"
  round 2 hole 1 paste-1.58: N(3.75,0)
  rect 2x2 hole 1 paste-1.58: P(-3.75,0)
  silkscreen extent -9.1,-9.1 9.1,9.1, body extent -9.1,-9.1 9.11,9.1, height 42.01
CUI_CMI-9605IC-0580T [mm]
  round 1.6 hole 0.8: N(0,-2.5) P(0,2.5)
  silkscreen extent -4.8,-4.8 4.8,4.8, body extent -4.8,-4.8 4.8,4.8, height 5.1
DIOM795X585X240L100X300N [mm] "Diode, Molded Body; 6.85 mm L X 5.85 mm W X 2.40 mm H body"
  rrect28% 1.8x3.1 smd: A(3.66,0) C(-3.66,0)
  silkscreen extent -3.5,-3.05 3.5,3.05, body extent -3.98,-2.92 3.98,2.92, height 2.4
DPAK6P170_1524X482L228X75T770X800N [mm] "DPAK, 1.702 mm pitch; 5 pin, 9.017 mm L X 10.16 mm W X 4.82 mm H body"
  rect 1.1x3.8 smd: 1(-3.404,-6.32)
  oval 1.1x3.8 smd: 2(-1.702,-6.32) 3(0,-6.32) 4(1.702,-6.32) 5(3.404,-6.32)
  rrect6% 8.17x8.72 smd paste-8.72: EP(0,3.93)
  rrect6% 10x2.6 smd paste-8.72: EP(0,7)
  silkscreen extent -5.33,-2.9 5.33,8.62, body extent -4.94,-7.29 4.89,7.32, height 4.22
HOLE/0.8/1.4-R [mm] "hole rect 0.8/1.4"
  rect 1.4x1.4 hole 0.8 paste-1.4: 1(0,0)
  silkscreen extent -1,-1 1,1
HOLE/3.5/4.5-O [mm] "hole round 3.5/4.5"
  round 4.5 hole 3.5 paste-1.4: 1(0,0)
JST_B04B-PASK-1 [mm]
  round 1.1 hole 1.1 unplated mask-1: 0(-4.5,-1.7)
  rect 1.3x1.3 hole 0.7: 1(-3,0)
  round 1.3 hole 0.7: 2(-1,0) 3(1,0) 4(3,0)
  silkscreen extent -6.14,-2.27 5.08,3.18, body extent -5,-2.2 5,3.1, height 7.75
Keystone-1074 [mm] "Battery holder"
  round 1.6 hole 1: 1(0,-1.9) 2(-5,1.9) 2(5,1.9)
  silkscreen extent -6.6,-3 6.6,5.9, body extent -11.5,-2.93 11.5,3.17, height 18.38
LEDC160X80X40L30N [mm] "LED, Chip; 1.60 mm L X 0.80 mm W X 0.40 mm H body"
  rrect50% 0.8x0.9 smd: A(0.75,0) C(-0.75,0)
  silkscreen extent -1.63,-0.65 1.4,0.65, body extent -0.77,-0.4 0.83,0.4, height 0.7
Molex-0510150500 [mm] "Header, Vertical, 2.00 mm pitch, 5 pins, 1 row, 5 pins per row"
  rect 1.4x1.4 hole 0.8 paste-1.6: 1(-4,0)
  round 1.4 hole 0.8 paste-1.6: 2(-2,0) 3(0,0) 4(2,0) 5(4,0)
  silkscreen extent -5.27,-1.2 5.27,2.46
Molex_0039281043 [mm] "Connector Header Through Hole 4 position 4.2mm"
  rect 2.3x2.3 hole 1.4 paste-1000 mask+0: 1(-2.1,2.55)
  round 2.3 hole 1.4 paste-1000 mask+0: 2(2.1,2.55) 3(-2.1,-2.95) 4(2.1,-2.95)
  silkscreen extent -7,-6.4 5.5,5, body extent -5.6,-6.5 5.8,5.1, height 0.25
MURATA_DLW5BTM142TQ2L [mm]
  rect 0.75x0.75 smd: 1(0.875,1.075) 2(-0.875,1.075) 3(-0.875,-1.075) 4(0.875,-1.075)
  Top Layer region: -0.45,0.65 -1.45,0.65 -1.45,1.65 -2.75,1.65 -2.75,2.35 -0.45,2.35
  Top Layer region: 1.45,-1.65 2.75,-1.65 2.75,-2.35 0.45,-2.35 0.45,-0.65 1.45,-0.65
  Top Layer region: 2.75,1.65 1.45,1.65 1.45,0.65 0.45,0.65 0.45,2.35 2.75,2.35
  Top Layer region: -0.45,-2.35 -2.75,-2.35 -2.75,-1.65 -1.45,-1.65 -1.45,-0.65 -0.45,-0.65
  silkscreen extent -2.65,-2.66 4.22,2.66, body extent -2.5,-2.5 2.5,2.5, height 2.5
"NTC - Through hole" [mm]
  rect 1.4x1.4 hole 0.7 paste-1.6: 1(-1,0)
  round 1.4 hole 0.7 paste-1.6: 2(1,0)
  silkscreen extent -2.5,-1.05 2.5,1.05
QFN29P50_500X500X100L55X23T315N [mm] "Quad Flat No-Lead (QFN with Tab), 0.50 mm pitch; square, 7 pin X 7 pin, 5.00 mm L X 5.00 mm W X 1.00 mm H body"
  rect 0.25x0.85 smd: 1(-1.5,-2.325)
  oval 0.25x0.85 smd: 2(-1,-2.325) 3(-0.5,-2.325) 4(0,-2.325) 5(0.5,-2.325) 6(1,-2.325) 7(1.5,-2.325) 15(1.5,2.325) 16(1,2.325) 17(0.5,2.325) 18(0,2.325) 19(-0.5,2.325) 20(-1,2.325) 21(-1.5,2.325)
  oval 0.85x0.25 smd: 8(2.325,-1.5) 9(2.325,-1) 10(2.325,-0.5) 11(2.325,0) 12(2.325,0.5) 13(2.325,1) 14(2.325,1.5) 22(-2.325,1.5) 23(-2.325,1) 24(-2.325,0.5) 25(-2.325,0) 26(-2.325,-0.5) 27(-2.325,-1) 28(-2.325,-1.5)
  rect 3.05x3.05 smd paste-3.05 mask-3.05: EP(0,0)
  Top Layer region: 1.575,0 1.575,-1.525 1.574,-1.533 1.573,-1.54 1.57,-1.548 1.566,-1.554 1.56,-1.56 1.554,-1.566 1.548,-1.57 1.54,-1.573 1.533,-1.574 -1.525,-1.575 -1.575,-1.525 -1.575,1.525 -1.574,1.533 -1.573,1.54 -1.57,1.548 -1.566,1.554 -1.56,1.56 -1.554,1.566 -1.548,1.57 -1.54,1.573 -1.533,1.574 1.525,1.575 1.533,1.574 1.54,1.573 1.548,1.57 1.554,1.566 1.56,1.56 1.566,1.554 1.57,1.548 1.573,1.54 1.574,1.533 1.575,1.525 1.575,0
  silkscreen extent -3.1,-3.1 3.1,3.1, body extent -2.55,-2.55 2.55,2.55, height 1
QFP64P50_1200X1200X160L60X22N [mm] "Quad Flat Pack (QFP), 0.50 mm pitch; square, 16 pin X 16 pin, 10.00 mm L X 10.00 mm W X 1.60 mm H body"
  rect 0.25x1.2 smd: 1(-3.75,-5.7)
  oval 0.25x1.2 smd: 2(-3.25,-5.7) 3(-2.75,-5.7) 4(-2.25,-5.7) 5(-1.75,-5.7) 6(-1.25,-5.7) 7(-0.75,-5.7) 8(-0.25,-5.7) 9(0.25,-5.7) 10(0.75,-5.7) 11(1.25,-5.7) 12(1.75,-5.7) 13(2.25,-5.7) 14(2.75,-5.7) 15(3.25,-5.7) 16(3.75,-5.7) 33(3.75,5.7) 34(3.25,5.7) 35(2.75,5.7) 36(2.25,5.7) 37(1.75,5.7) 38(1.25,5.7) 39(0.75,5.7) 40(0.25,5.7) 41(-0.25,5.7) 42(-0.75,5.7) 43(-1.25,5.7) 44(-1.75,5.7) 45(-2.25,5.7) 46(-2.75,5.7) 47(-3.25,5.7) 48(-3.75,5.7)
  oval 1.2x0.25 smd: 17(5.7,-3.75) 18(5.7,-3.25) 19(5.7,-2.75) 20(5.7,-2.25) 21(5.7,-1.75) 22(5.7,-1.25) 23(5.7,-0.75) 24(5.7,-0.25) 25(5.7,0.25) 26(5.7,0.75) 27(5.7,1.25) 28(5.7,1.75) 29(5.7,2.25) 30(5.7,2.75) 31(5.7,3.25) 32(5.7,3.75) 49(-5.7,3.75) 50(-5.7,3.25) 51(-5.7,2.75) 52(-5.7,2.25) 53(-5.7,1.75) 54(-5.7,1.25) 55(-5.7,0.75) 56(-5.7,0.25) 57(-5.7,-0.25) 58(-5.7,-0.75) 59(-5.7,-1.25) 60(-5.7,-1.75) 61(-5.7,-2.25) 62(-5.7,-2.75) 63(-5.7,-3.25) 64(-5.7,-3.75)
  silkscreen extent -6.58,-6.58 6.58,6.58, body extent -6,-6 6,6, height 1.6
"RESC160X80X55L30N - Full legend" [mm] "Resistor, Chip; 1.60 mm L X 0.80 mm W X 0.55 mm H body"
  rrect51% 0.9x0.9 smd: 1(-0.8,0) 2(0.8,0)
  silkscreen extent -1.5,-0.7 1.5,0.7, body extent -0.8,-0.4 0.8,0.4, height 0.55
"RESC200X125X70L40N - full legend" [mm] "Resistor, Chip; 2.00 mm L X 1.25 mm W X 0.70 mm H body"
  rrect51% 1x1.3 smd: 1(-1,0) 2(1,0)
  silkscreen extent -1.75,-0.9 1.75,0.9, body extent -1,-0.63 1,0.62, height 0.7
RESC640X320X70L60N [mm] "Resistor, Chip; 6.40 mm L X 3.20 mm W X 0.70 mm H body"
  rrect40% 1.3x3.3 smd: 1(-3.1,0) 2(3.1,0)
  silkscreen extent -4,-1.85 4,1.85, body extent -3.2,-1.6 3.2,1.6, height 0.7
RESC670X720X125L115N [mm] "Resistor, Chip; 6.70 mm L X 7.20 mm W X 1.25 mm H body"
  rrect26% 2.7x8 smd: 1(-3.5,0) 2(3.5,0)
  silkscreen extent -1.9,-3.7 1.85,3.7, body extent -3.35,-3.6 3.35,3.6, height 1.25
Samtec_SMA-J-P-H-RA-TH1 [mm]
  round 2.2 / inner round 2.2 / far side round 2.4 hole 1.5: 1(0,0) 2(-2.54,2.54) 2(-2.54,-2.54) 2(2.54,2.54) 2(2.54,-2.54)
  silkscreen extent -3.55,-3.55 3.55,3.55, body extent -3.5,-3.5 3.5,11.6, height 10
SIP800W50P254L1220H1010Q3 [mm] "SIP, 2.54 mm pitch; 3 pin, 12.20 mm L X 8.00 mm W X 10.10 mm H body"
  rect 1.18x1.18 / inner round 1.18 / far side rect 1.18x1.18 hole 0.7 paste-1.18: 1(-2.54,0)
  round 1.18 hole 0.7 paste-1.18: 2(0,0) 3(2.54,0)
  silkscreen extent -6.01,-3.49 6.03,5.68, body extent -5.84,-2 5.86,5.5, height 10.15
SIP950W50P254L2200H1150Q8 [mm] "SIP, 2.54 mm pitch; 8 pin, 22.00 mm L X 9.50 mm W X 11.50 mm H body"
  rect 1.5x1.5 hole 0.8 paste-1.2: 1(0,0)
  round 1.5 hole 0.8 paste-1.2: 2(2.5,0) 3(5,0) 5(10,0) 6(12.5,0) 7(15,0) 8(17.5,0)
  silkscreen extent -2,-5.9 19.8,3.3, body extent -2,-5.9 19.8,3.3, height 11.25
SK22D07 [mm]
  oval 1.2x2 hole 0.6 slot 1.4 at 90 deg: 0(-5,0) 0(5,0)
  rect 1.5x1.5 hole 0.8: 1(-2,1.25)
  round 1.5 hole 0.8: 2(0,1.25) 3(2,1.25) 4(-2,-1.25) 5(0,-1.25) 6(2,-1.25)
  silkscreen extent -5.6,-3.5 5.6,3.5, body extent -5.15,-9.03 5.15,2.97, height 5.07
SOD250X125X110L30X32N [mm] "Diode, Small Outline Diode (SOD); 1.70 mm L X 1.25 mm W X 1.10 mm H body"
  rrect50% 0.9x0.6 smd: A(1.2,0) C(-1.2,0)
  silkscreen extent -2.25,-0.72 1.97,0.72, body extent -1.25,-0.62 1.25,0.62, height 1.1
SODFL160X80X65L30X30N [mm] "Diode, Small Outline Diode Flat Lead (SODFL); 1.20 mm L X 0.80 mm W X 0.65 mm H body"
  rrect50% 0.6x0.4 smd: A(0.8,0) C(-0.8,0)
  silkscreen extent -1.5,-0.45 1.3,0.45, body extent -0.8,-0.4 0.8,0.4, height 0.65
SODFL250X125X80L40X32N [mm] "Diode, Small Outline Diode Flat Lead (SODFL); 1.70 mm L X 1.25 mm W X 0.80 mm H body"
  rrect50% 0.8x0.4 smd: A(1.1,0) C(-1.1,0)
  silkscreen extent -2.02,-0.72 1.73,0.72, body extent -1.25,-0.63 1.25,0.63, height 0.8
SOIC-8 [mm] "SOIC pitch=1.27mm, L*W=4.9mm*3.9mm"
  rect 0.5x1.3 smd: 1(-1.905,-2.7)
  oval 0.5x1.3 smd: 2(-0.635,-2.7) 3(0.635,-2.7) 4(1.905,-2.7) 5(1.905,2.7) 6(0.635,2.7) 7(-0.635,2.7) 8(-1.905,2.7)
  silkscreen extent -2.75,-4.5 2.32,1.8, body extent -2.45,-2.95 2.45,2.95, height 1.65
SON7P95_300X300X100L40X35T235X165N [mm] "Small Outline No-Lead (SON with Tab), 0.95 mm pitch; 6 pin, 3.00 mm L X 3.00 mm W X 1.00 mm H body"
  rect 0.4x0.74 smd: 1(-0.95,-1.395)
  oval 0.4x0.74 smd: 2(0,-1.395) 3(0.95,-1.395) 4(0.95,1.395) 5(0,1.395) 6(-0.95,1.395)
  rect 2.25x1.65 smd paste-2.25 mask-2.25: EP(0,0)
  Top Layer region: 1.175,0 1.175,-0.775 1.174,-0.783 1.173,-0.79 1.17,-0.798 1.165,-0.804 1.16,-0.81 1.154,-0.816 1.148,-0.82 1.141,-0.823 1.133,-0.824 -1.125,-0.825 -1.175,-0.775 -1.175,0.775 -1.174,0.783 -1.173,0.79 -1.17,0.798 -1.165,0.804 -1.16,0.81 -1.154,0.816 -1.148,0.82 -1.141,0.823 -1.133,0.824 1.125,0.825 1.133,0.824 1.141,0.823 1.148,0.82 1.154,0.816 1.16,0.81 1.165,0.804 1.17,0.798 1.173,0.79 1.174,0.783 1.175,0.775 1.175,0
  silkscreen extent -1.55,-2.93 1.55,1.55, body extent -1.5,-1.55 1.5,1.55, height 1
SOT23-3P95_235X110L50X40N [mm] "Small Outline Transistor (SOT23), 0.95 mm pitch; 3 pin, 2.90 mm L X 1.30 mm W X 1.10 mm H body"
  rect 0.5x1 smd: 1(-0.95,-1.05)
  oval 0.5x1 smd: 2(0.95,-1.05) 3(0,1.05)
  silkscreen extent -1.5,-0.7 1.5,0.7, body extent -1.45,-1.17 1.45,1.17, height 1.1
SOT23-5P65_210X110L36X22N [mm] "Small Outline Transistor (SOT23), 0.65 mm pitch; 5 pin, 2.00 mm L X 1.25 mm W X 1.10 mm H body"
  rect 0.3x0.75 smd: 1(-0.65,-0.975)
  oval 0.3x0.75 smd: 2(0,-0.975) 3(0.65,-0.975) 4(0.65,0.975) 5(-0.65,0.975)
  silkscreen extent -1.06,-2.43 0.95,0.4, body extent -1,-1.05 1,1.05, height 1.12
SOT23-5P95_280X145L45X40N [mm] "Small Outline Transistor (SOT23), 0.95 mm pitch; 5 pin, 2.90 mm L X 1.60 mm W X 1.45 mm H body"
  rect 0.5x1 smd: 1(-0.95,-1.25)
  oval 0.5x1 smd: 2(0,-1.25) 3(0.95,-1.25) 4(0.95,1.25) 5(-0.95,1.25)
  silkscreen extent -1.4,-2.83 1.4,0.55, body extent -1.45,-1.4 1.45,1.4, height 1.55
SOT143-4P192_237X122L40X40N [mm] "Small Outline Transistor (SOT143), 1.92 mm pitch; 4 pin, 2.92 mm L X 1.30 mm W X 1.22 mm H body"
  rrect31% 0.95x1 smd: 1(-0.75,-1.055)
  oval 0.5x1 smd: 2(0.95,-1.055) 3(0.95,1.055) 4(-0.95,1.055)
  silkscreen extent -1.52,-2.43 1.52,0.7, body extent -1.46,-1.18 1.46,1.18, height 1.22
TE_1571563-8 [mm]
  rrect50% 2.1x1.2 smd: 1(-4.55,2.25) 2(4.55,2.25) 3(-4.55,-2.25) 4(4.55,-2.25)
  silkscreen extent -7.5,-3 3,3, body extent -5,-3 5,3, height 5.12
"TO247-3 - SGIB" [mm]
  rect 3x4.5 hole 1.6: 1(-5.45,0)
  rrect80% 3x4.5 hole 1.6: 2(0,0) 3(5.45,0)
  silkscreen extent -9.5,-2.75 8,2.9, body extent -7.8,-0.3 7.8,26, height 5.7
"TO247-3 - SHORT PINS" [mm]
  rect 3x4.5 hole 1.6: 1(-5.45,0)
  rrect80% 3x4.5 hole 1.6: 2(0,0) 3(5.45,0)
  silkscreen extent -9.5,-2.9 8,2.9, body extent -7.8,-2.3 7.8,2.7, height 24.7
TRXSOFL6P50_160X162X60L20X22N [mm] "Transistor, Small Outline Flat Lead (SOFL), 0.50 mm pitch; 6 pin, 1.60 mm L X 1.175 mm W X 0.60 mm H body"
  rect 0.24x0.65 smd: 1(-0.5,-0.675)
  oval 0.24x0.65 smd: 2(0,-0.675) 3(0.5,-0.675) 4(0.5,0.675) 5(0,0.675) 6(-0.5,0.675)
  silkscreen extent -0.92,-2.13 0.9,1.25, body extent -0.8,-0.81 0.8,0.81, height 0.6
WF-02MR [mm] "Male  Pitch=2.54mm"
  rect 1.7x1.7 hole 1 paste-1: 1(-1.27,0)
  round 1.7 hole 1 paste-1: 2(1.27,0)
  silkscreen extent -2.53,1.7 2.53,18, body extent -2.54,-0.3 2.54,13.22, height 5.9
WURTH_7461097 [mm] "M6, blind 6.5mm"
  round 2 hole 1.6: 1(-3.81,-3.81) 1(-3.81,-1.27) 1(-3.81,1.27) 1(-3.81,3.81) 1(-1.27,-3.81) 1(-1.27,-1.27) 1(-1.27,1.27) 1(-1.27,3.81) 1(1.27,-3.81) 1(1.27,-1.27) 1(1.27,1.27) 1(1.27,3.81) 1(3.81,-3.81) 1(3.81,-1.27) 1(3.81,1.27) 1(3.81,3.81)
  silkscreen extent -5.1,-5.1 5.1,5.1, body extent -5,-5 5,5, height 10.5
XTAL1140X470X430D1310L435X63N [mm] "Crystal; 11.40 mm L X 4.70 mm W X 4.30 mm H body"
  rrect32% 4.8x1.2 smd: 1(-4.63,0) 2(4.63,0)
  silkscreen extent -5.75,-2.4 5.75,2.4, body extent -6.55,-2.35 6.55,2.35, height 4.3